# Altium PCB PCL.PcbDoc (part 1 of 3)
Units mil, origin at the board's own origin, x right, y up, seen from the top; angles counter-clockwise.
Board outline 5000 x 5000 mil, 4 copper layers (Top Layer, Layer 1, Layer 2, Bottom Layer), stack 64.009 mil thick; 153 components, 93 nets, 466 pads, 562 vias.
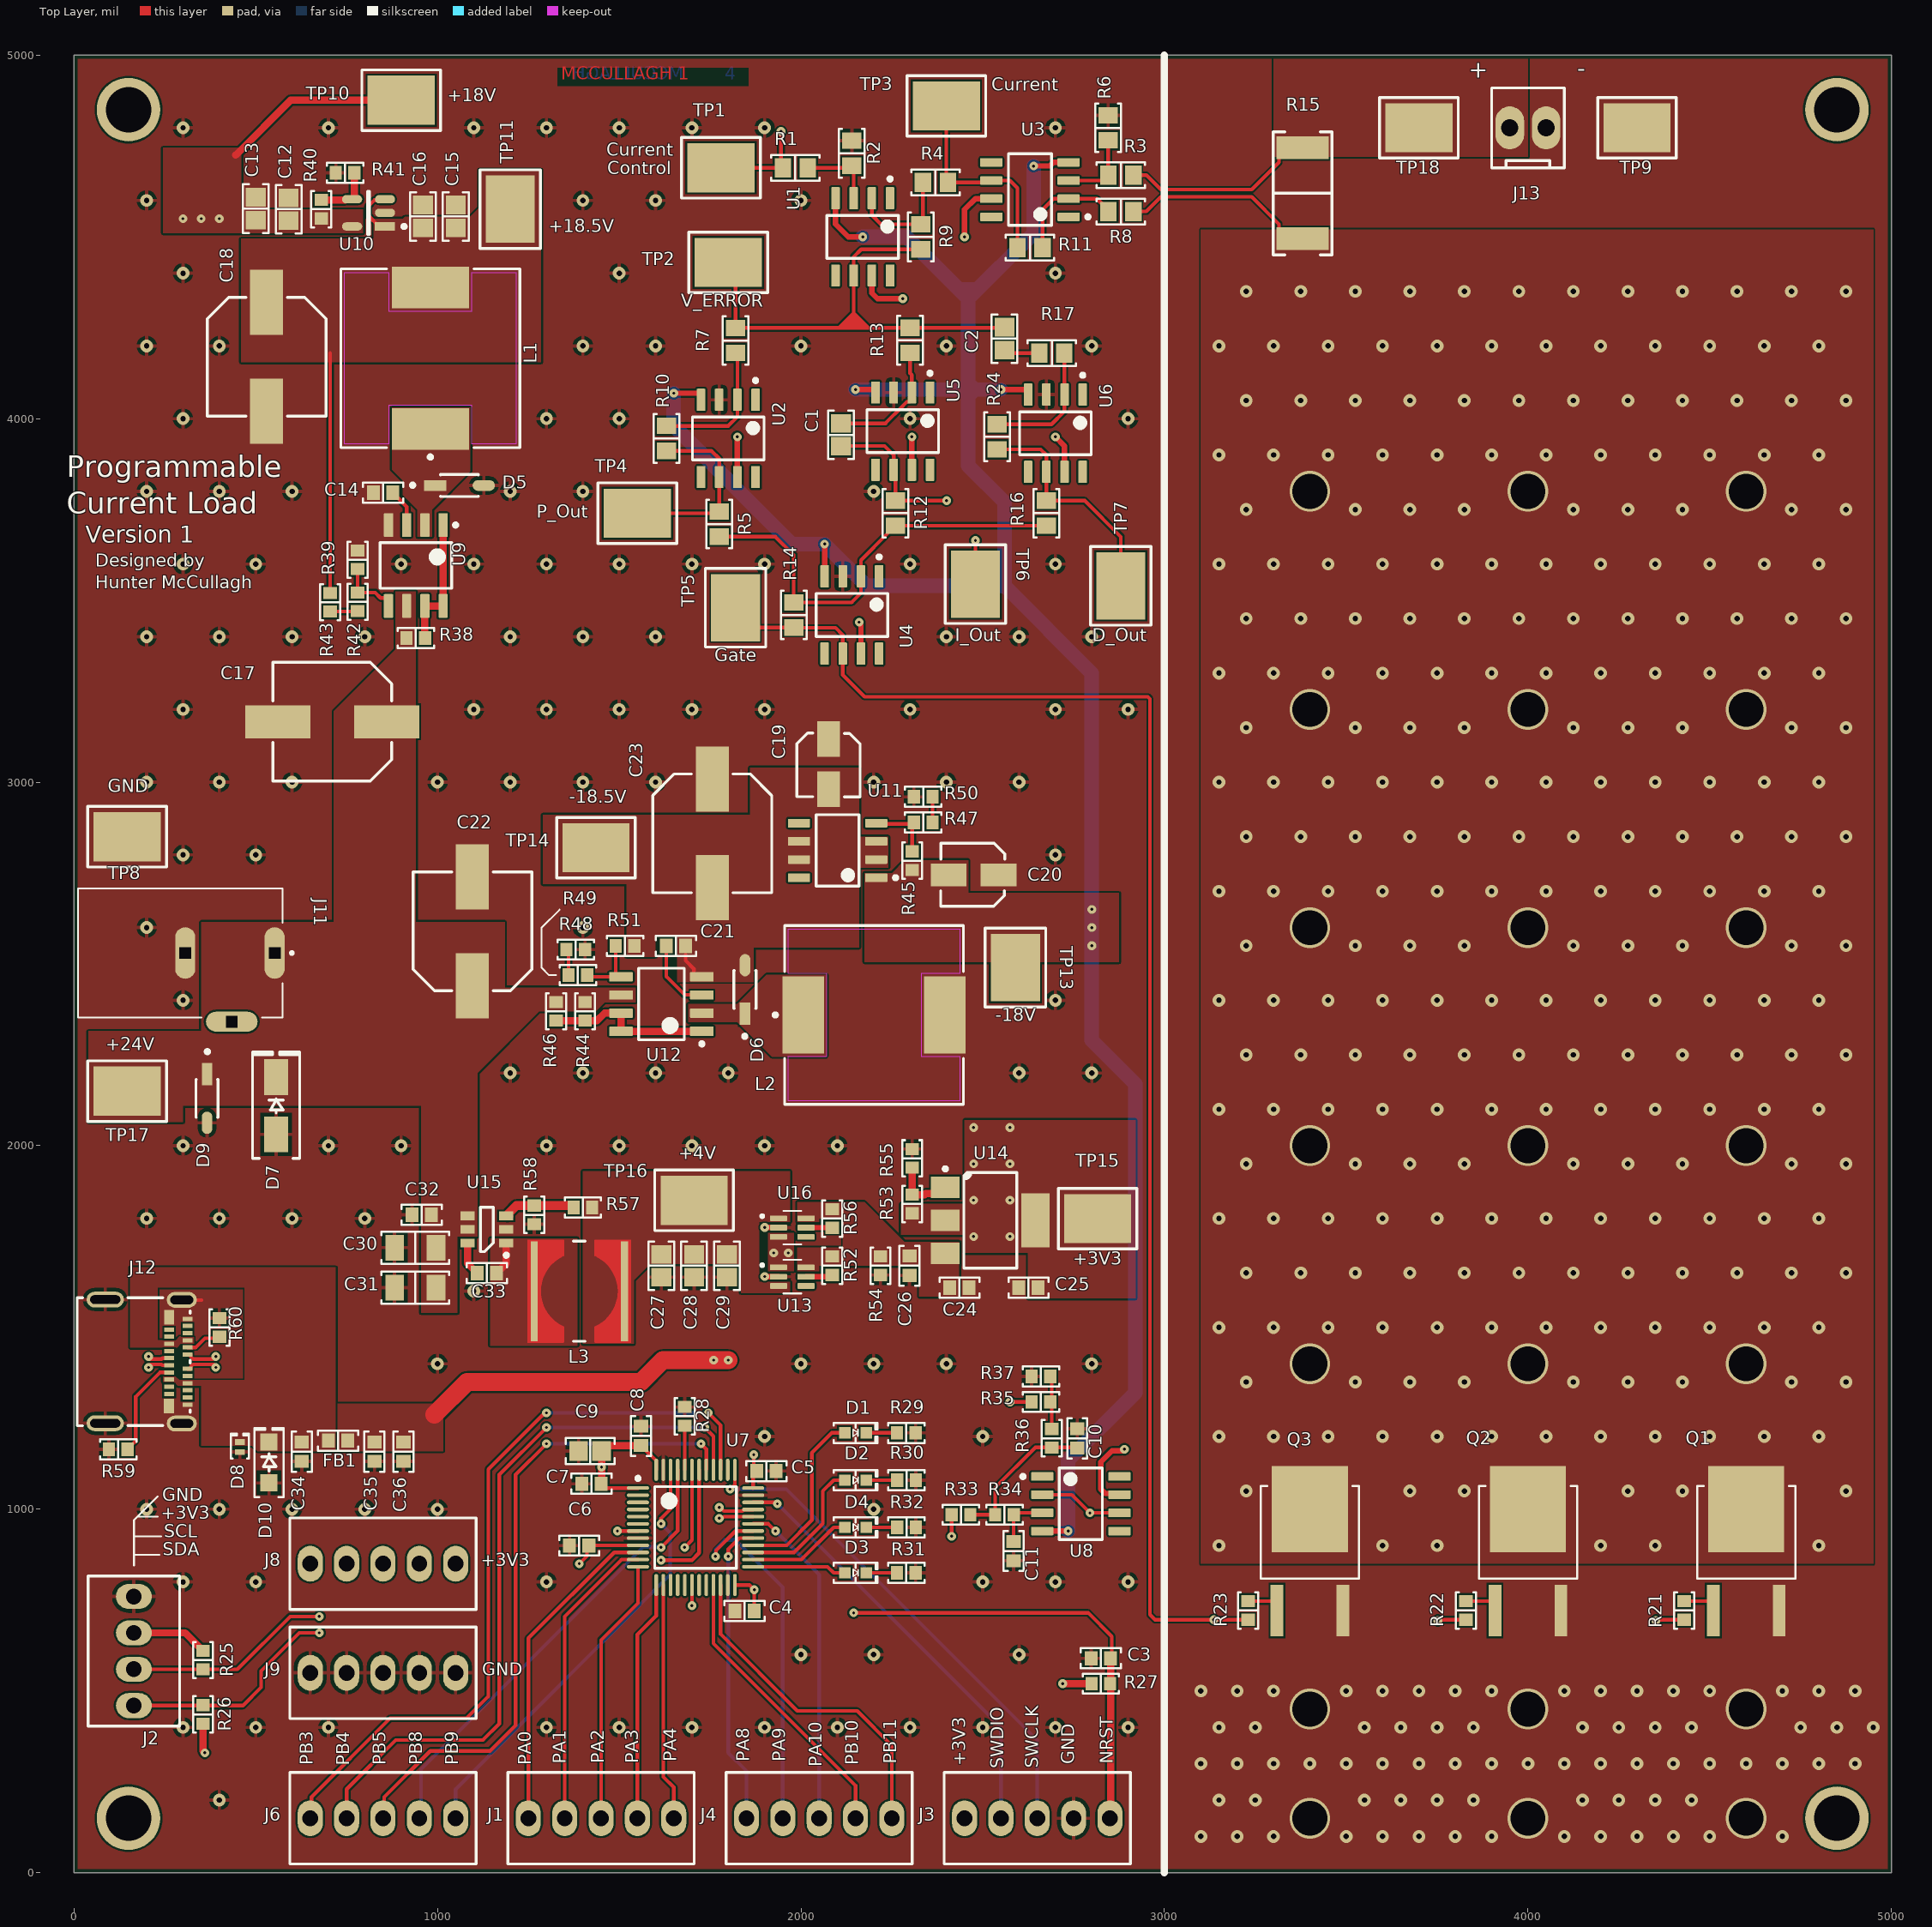
[diagram p0: Top Layer view]
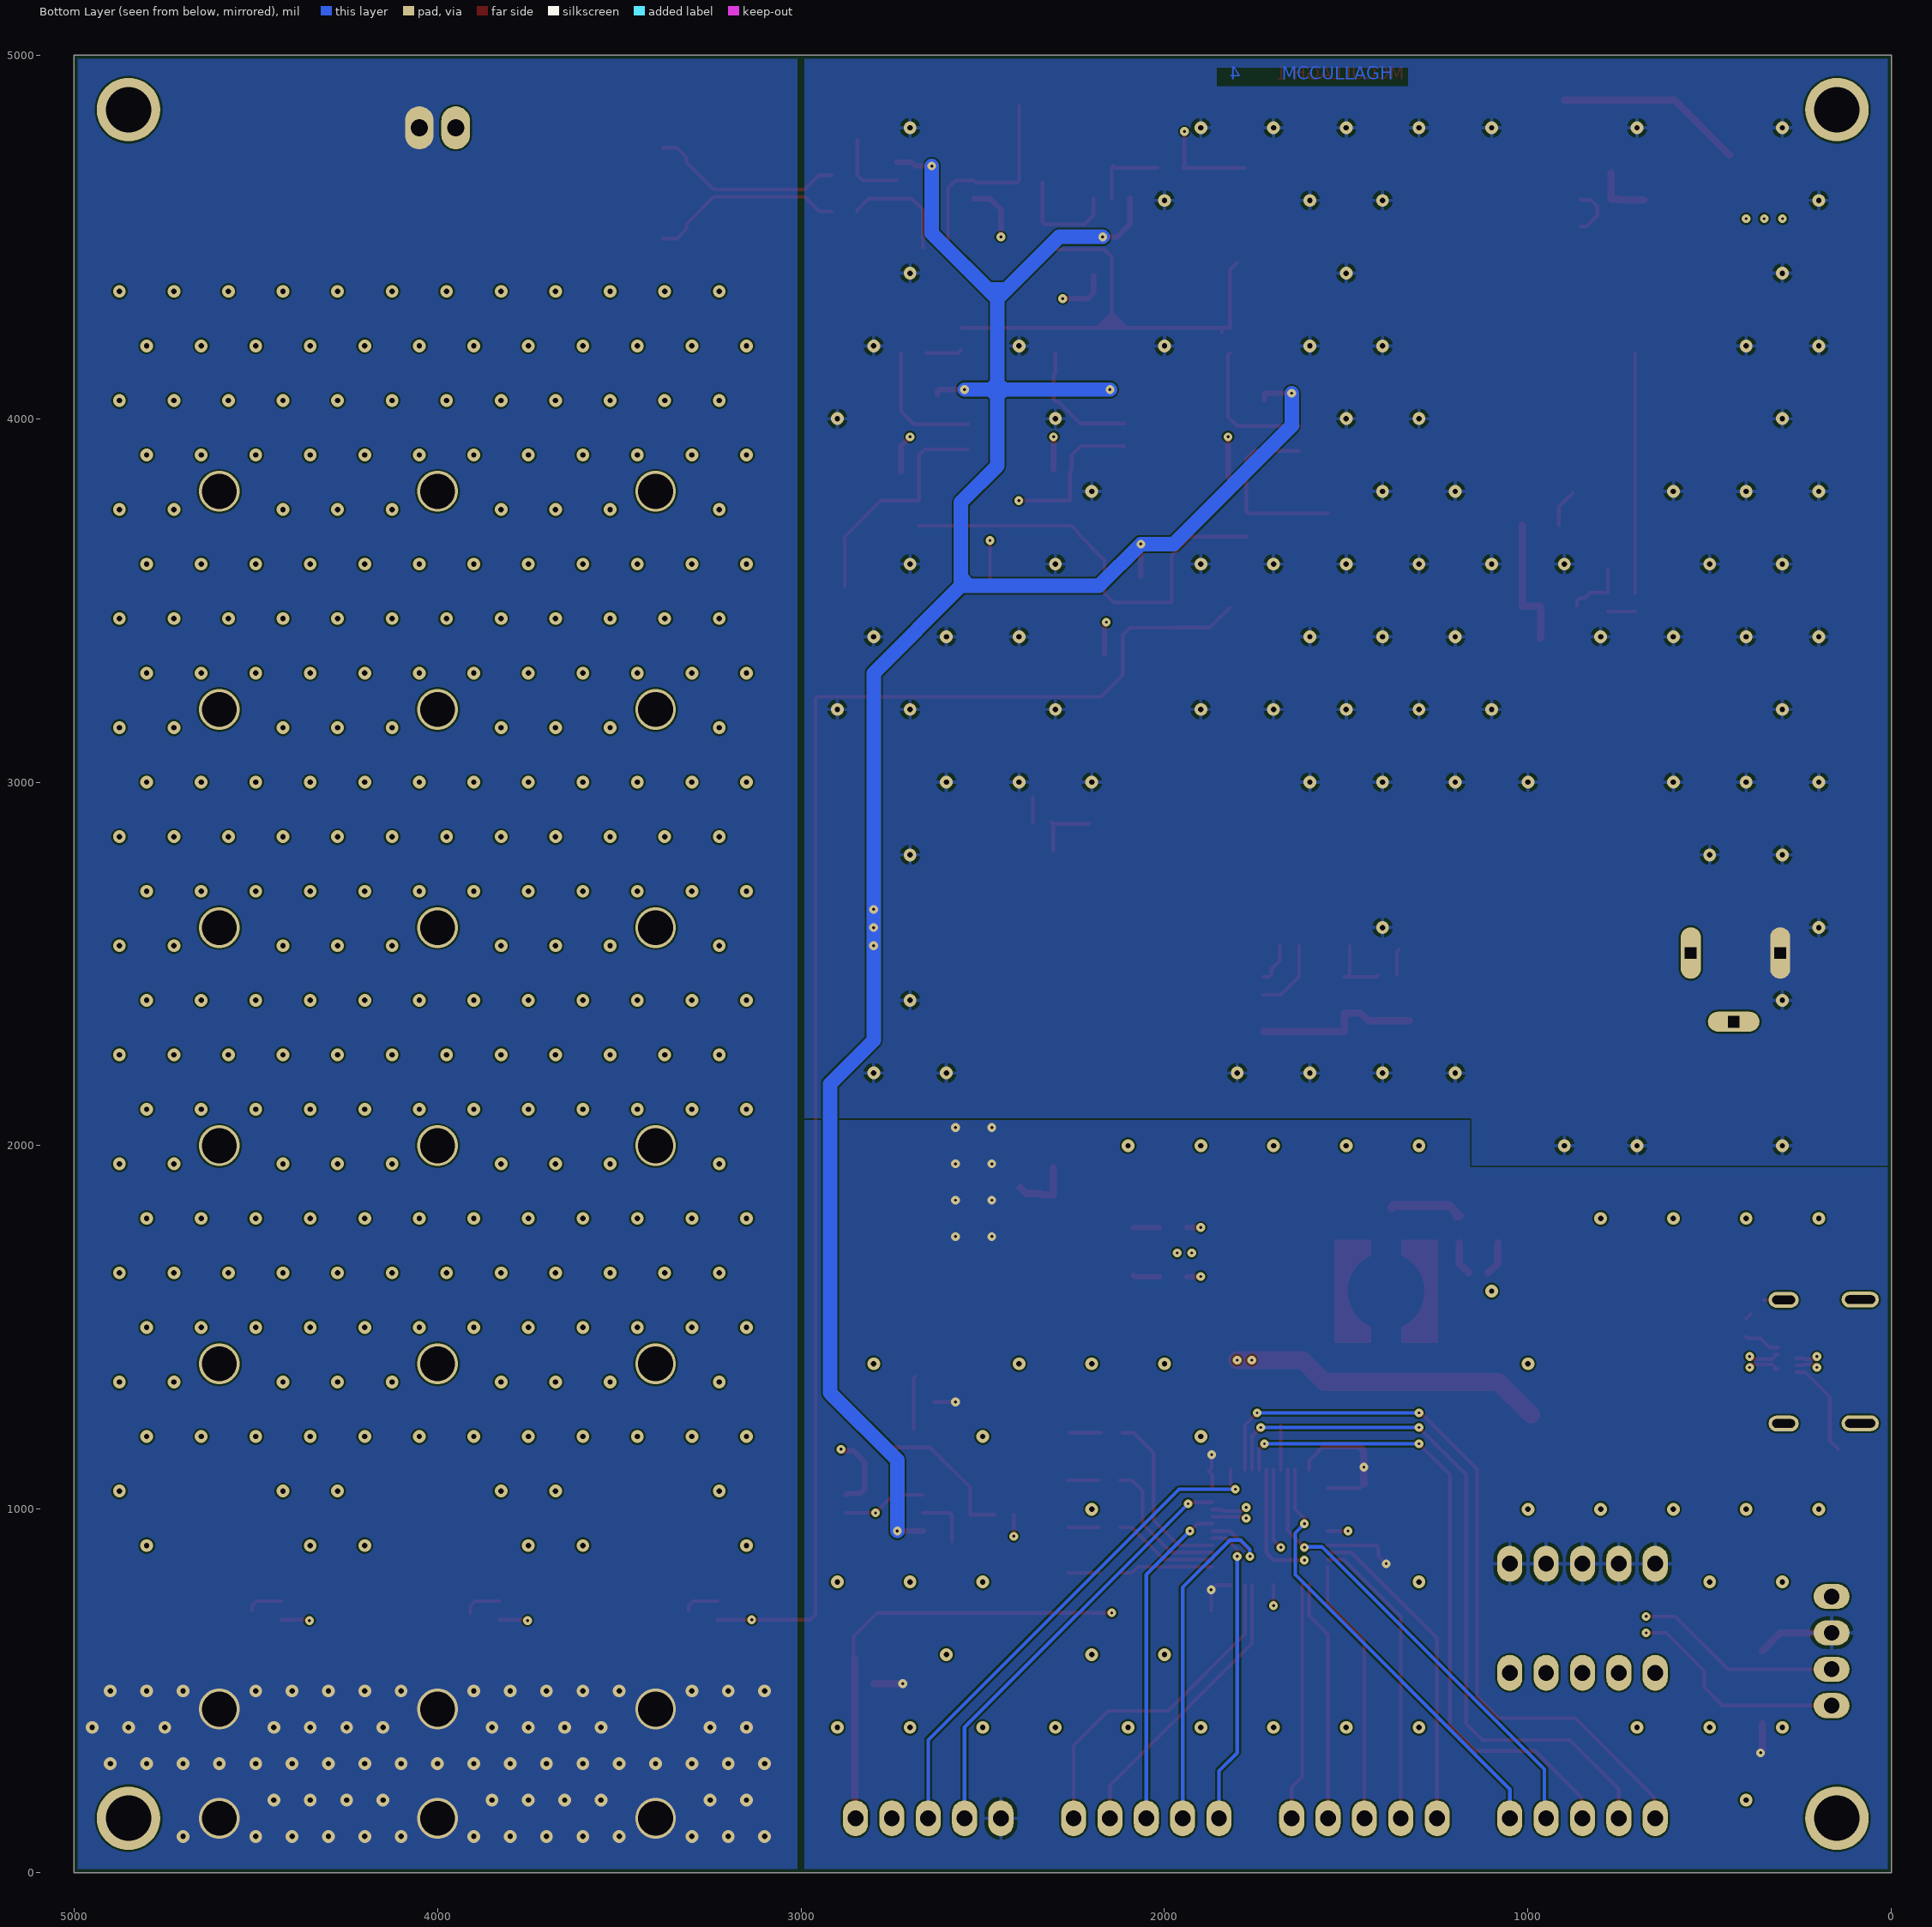
[diagram p1: Bottom Layer view, seen from below]
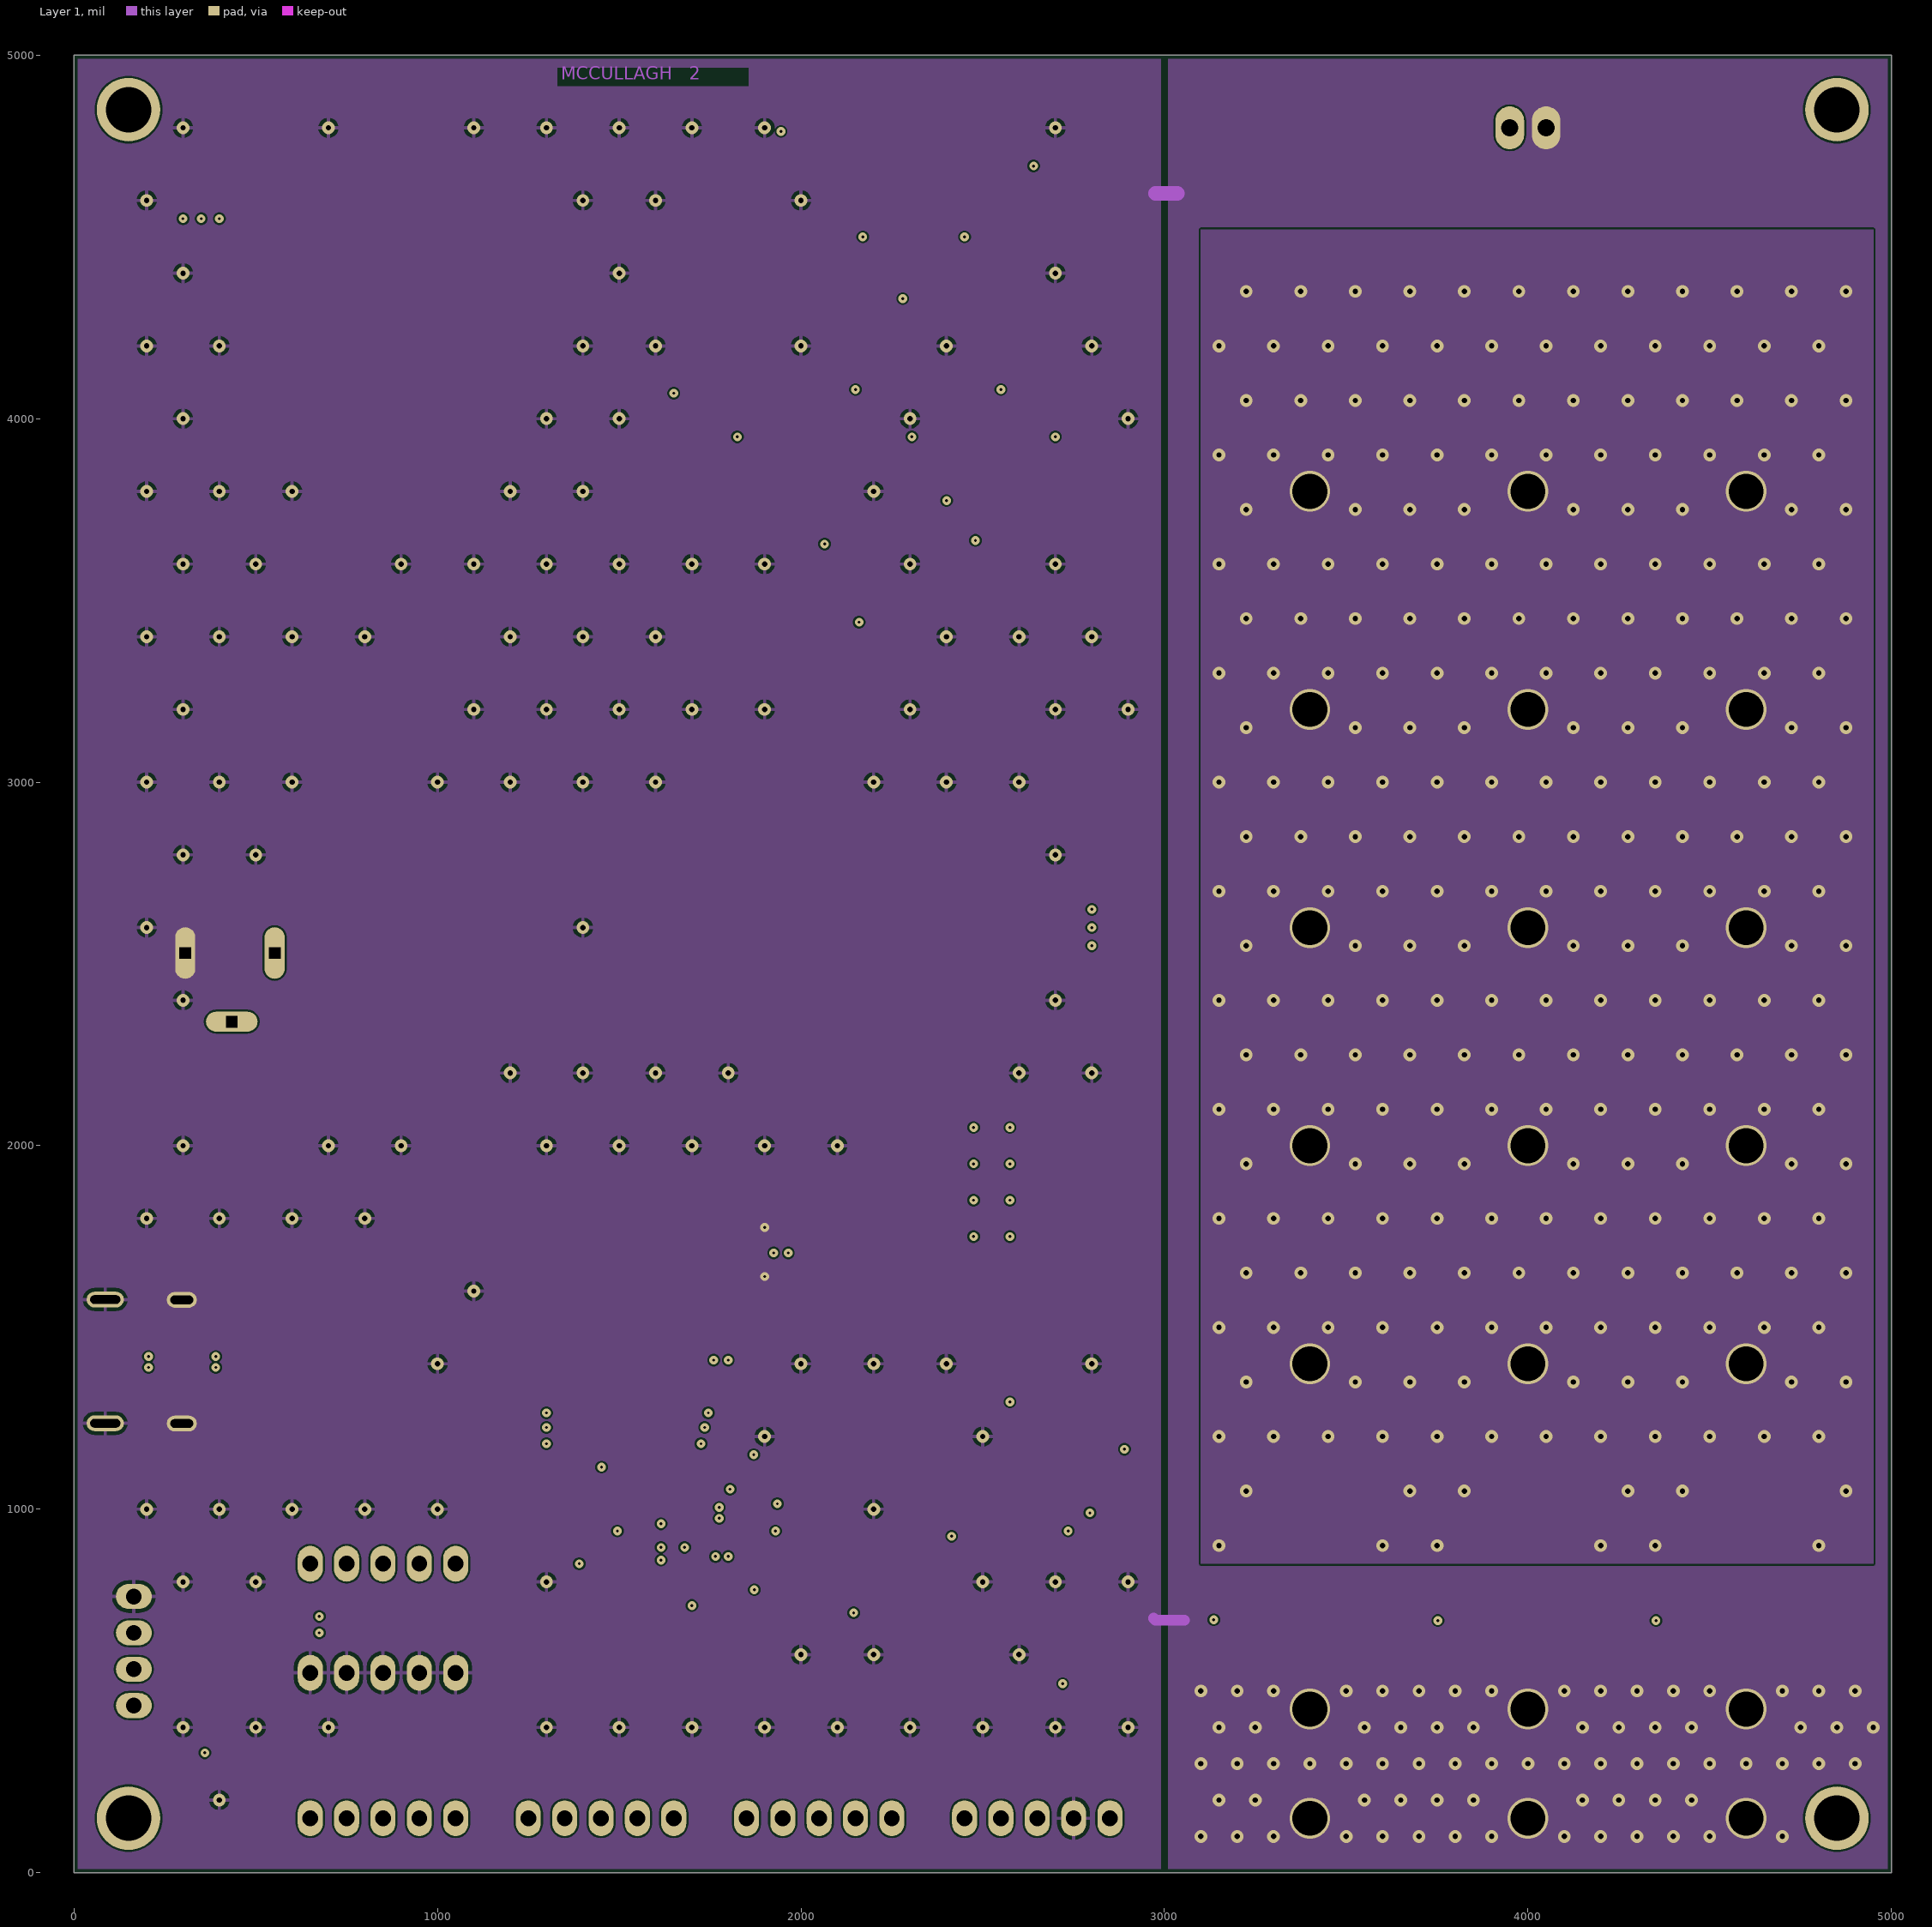
[diagram p2: Layer 1]
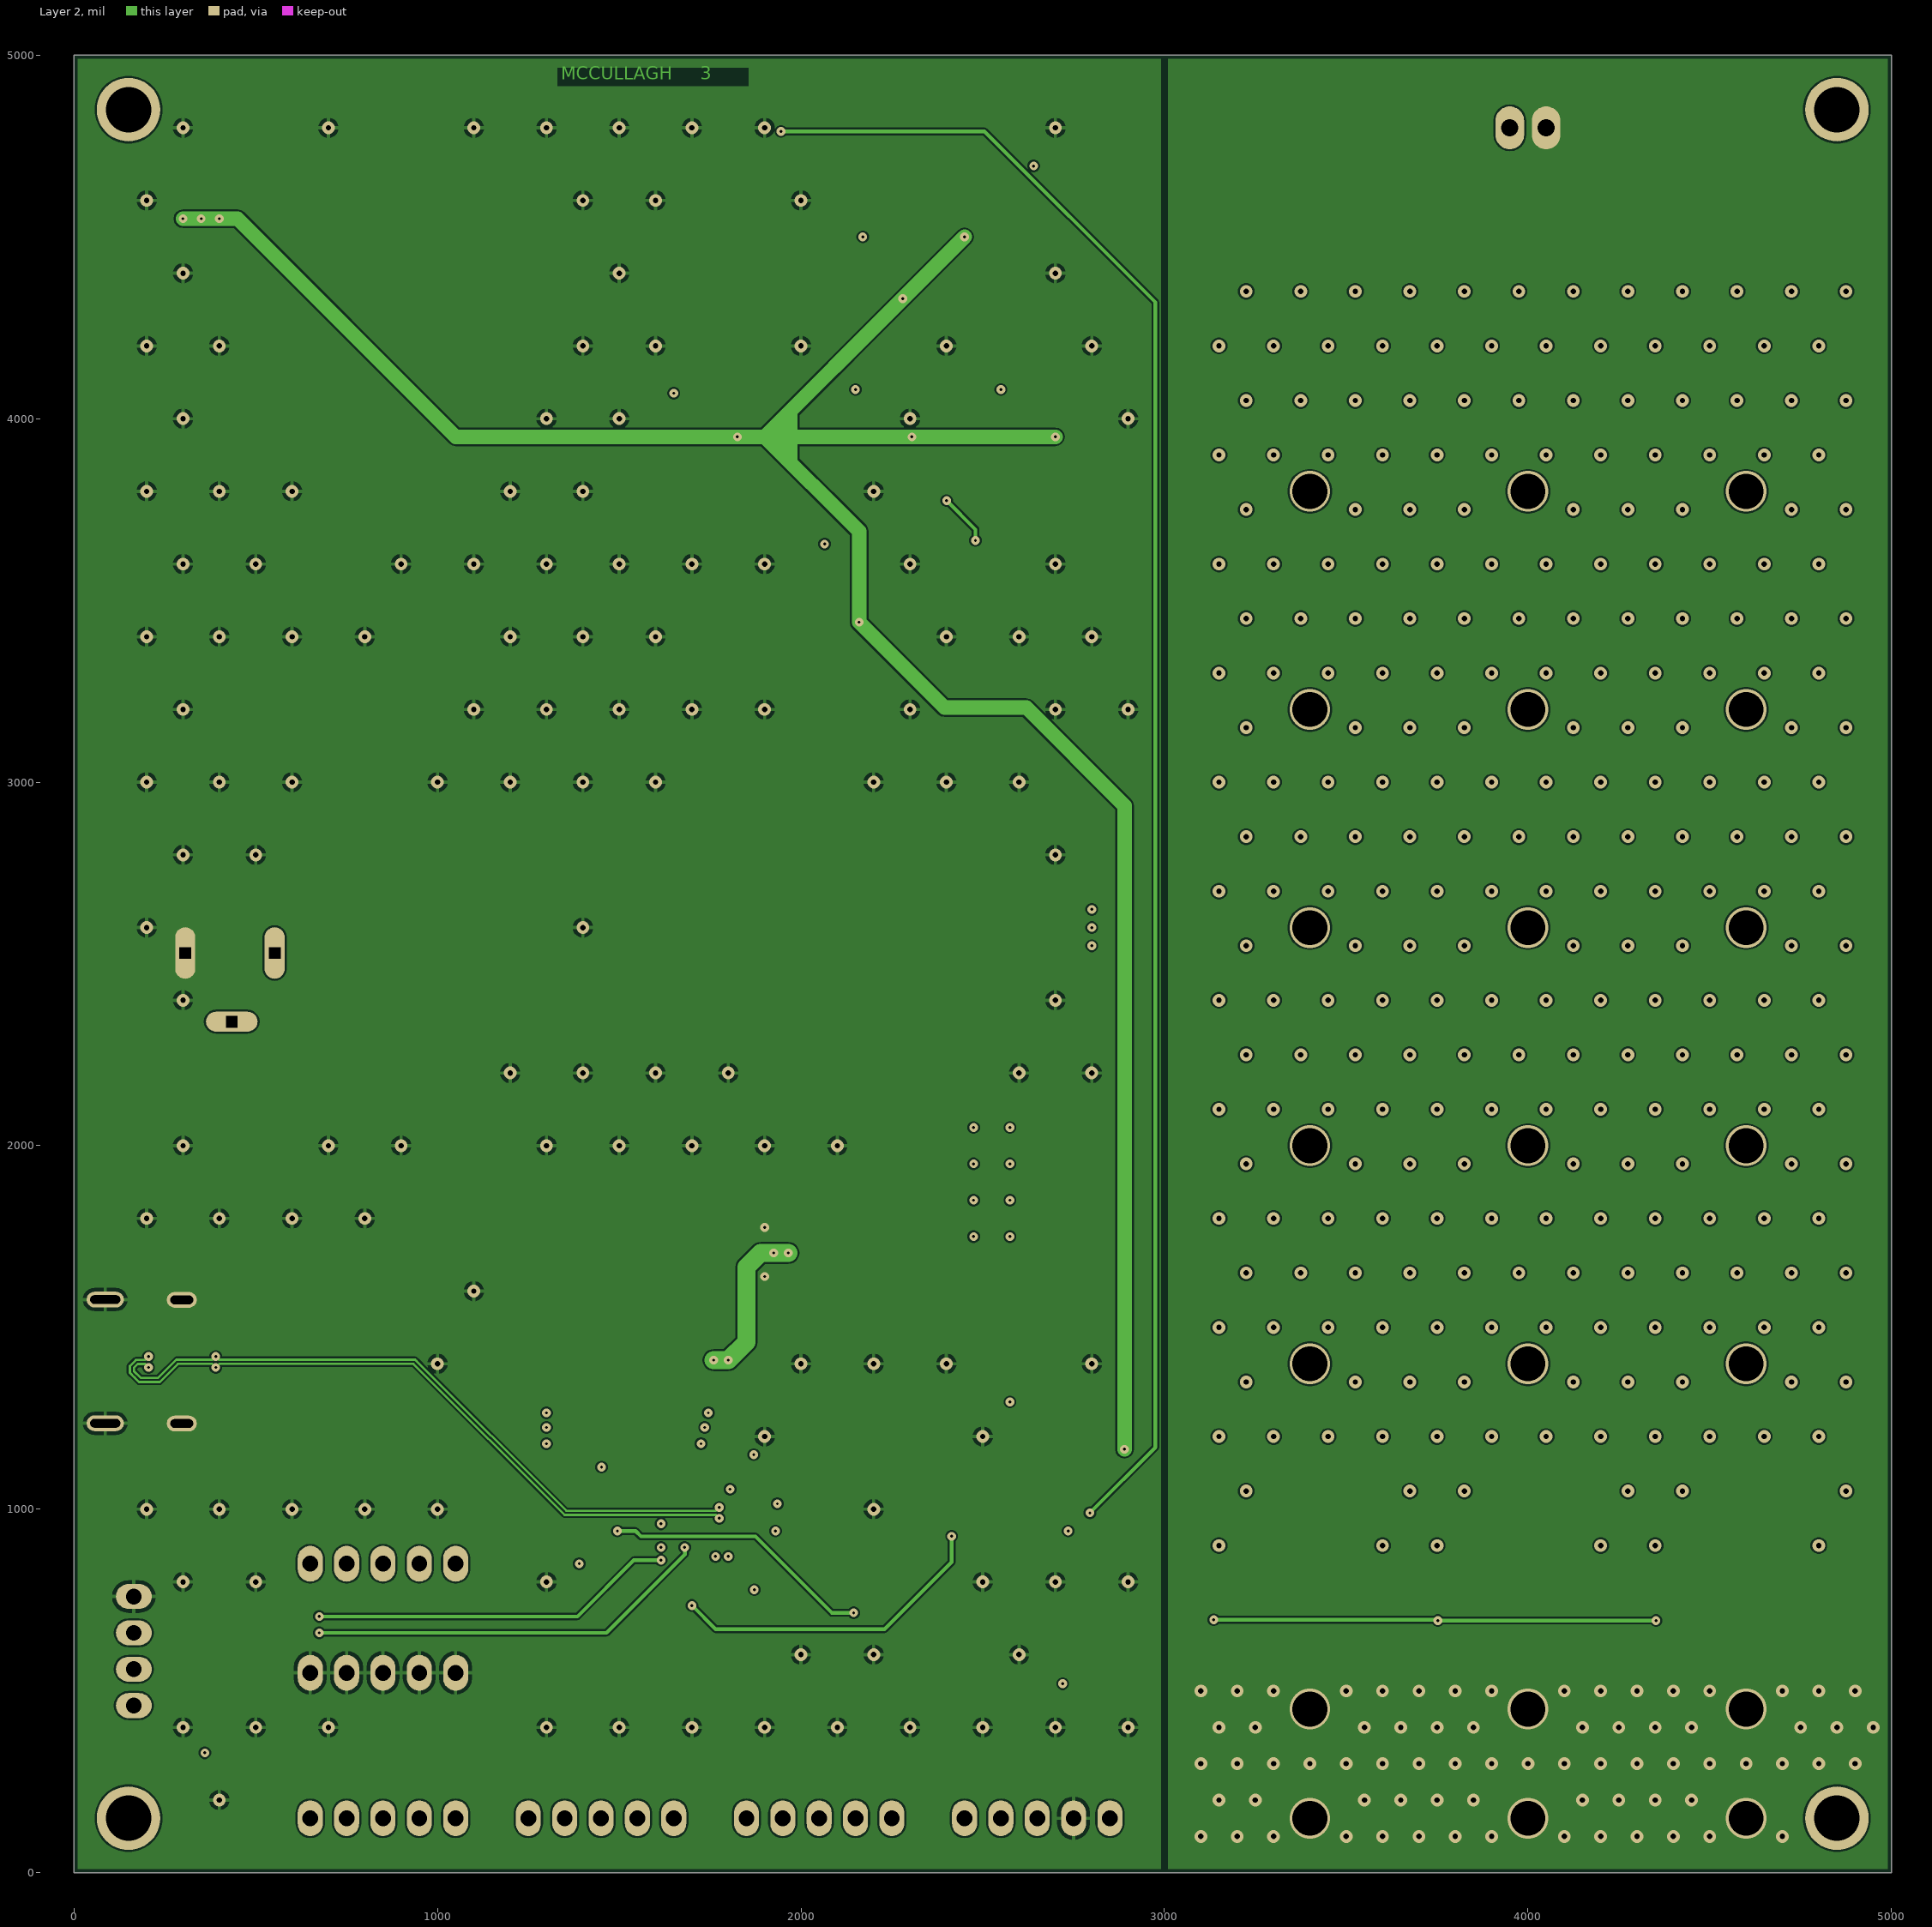
[diagram p3: Layer 2]
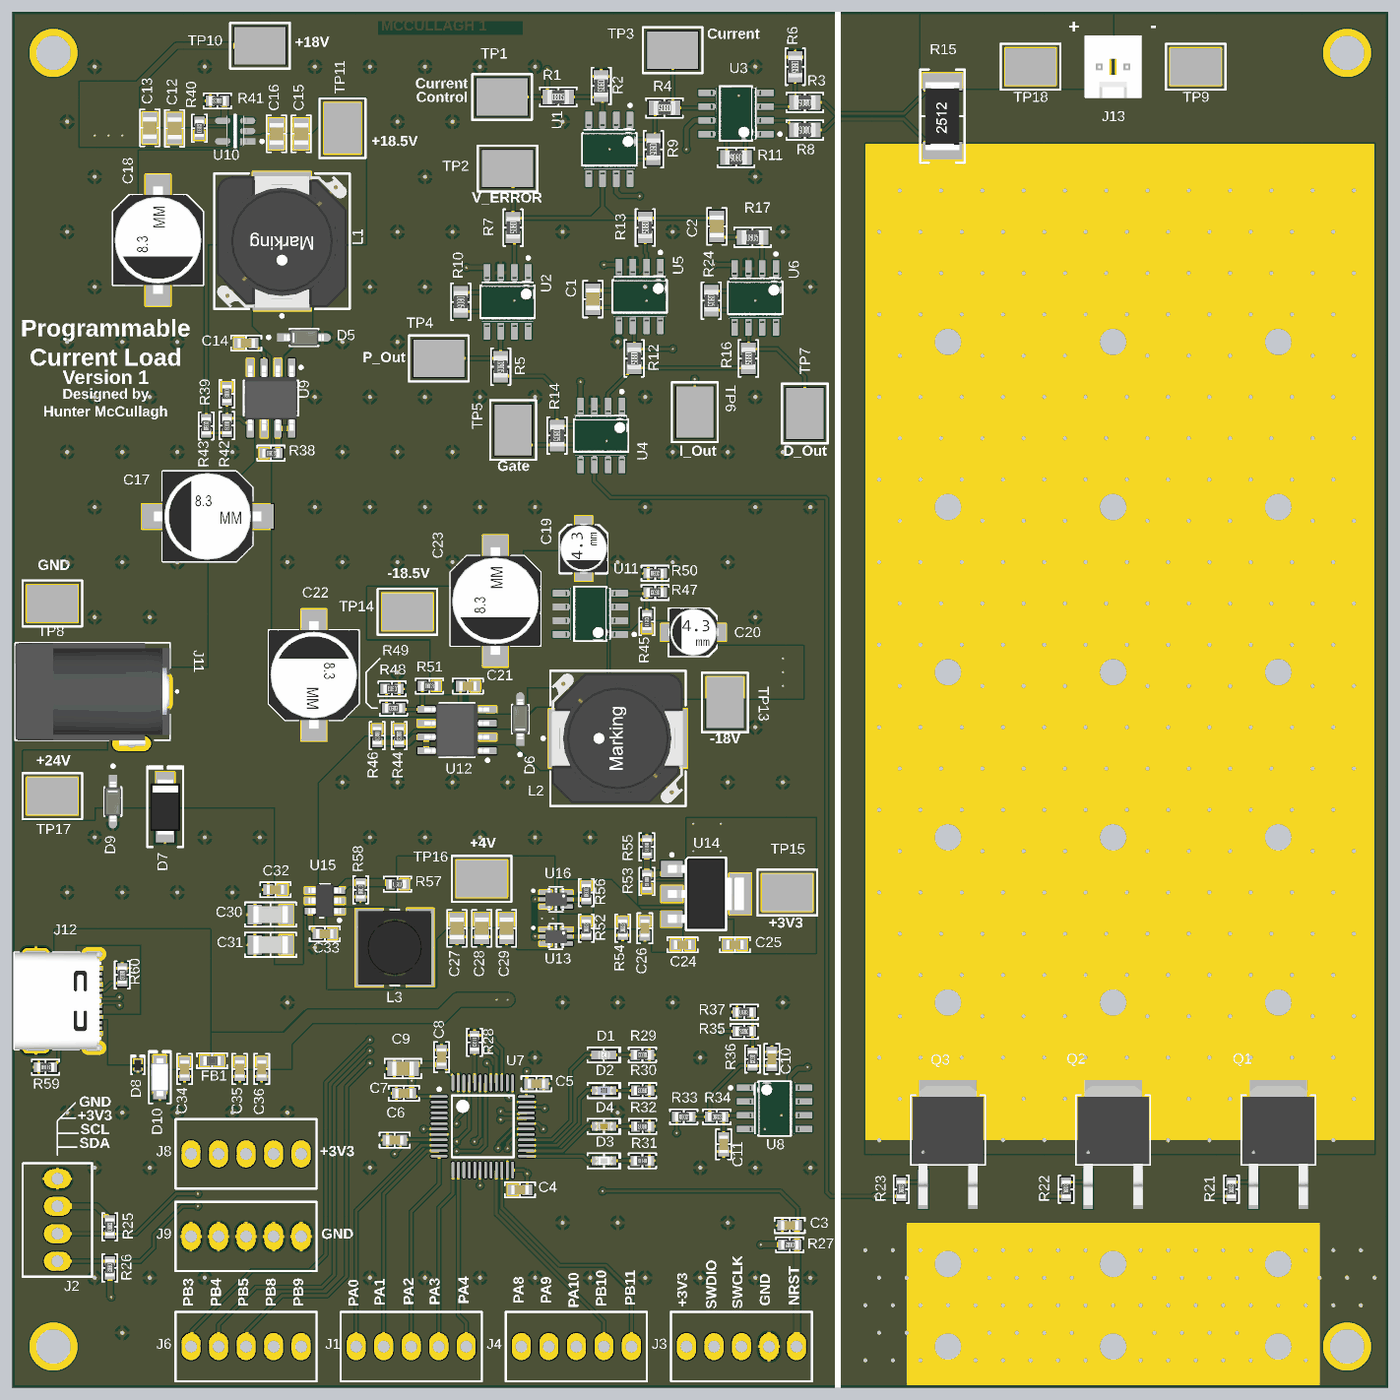
[diagram p5: 3D render of the assembled board from above, using the file's embedded part models]

## Layer stack, top to bottom
Top Solder: solder mask 0.4, Solder Resist, Dk 3.5
Top Layer: signal copper 1.378
Dielectric 2: prepreg 8.284, PP-006, Dk 4.1
Layer 1: signal copper 1.378
Dielectric 1: core 41.929, FR-4, Dk 4.8
Layer 2: signal copper 1.378
Dielectric 3: prepreg 8.284, PP-006, Dk 4.1
Bottom Layer: signal copper 1.378
Bottom Solder: solder mask 0.4, Solder Resist, Dk 3.5

## Board outline
0,0 5000,0 5000,5000 0,5000

## Design rules (kind name [scope] priority, off if disabled: settings)
Clearance [All] p1: gap=5 ignorepadtopadclearanceinfootprint=FALSE
DiffPairsRouting "Schematic Differential Pairs Routing_1" [InNet('d_p')] p1: maxlimit=5 minlimit=5 mostfreqgap=5 toplayer_minwidth=10.26 toplayer_maxwidth=10.26 toplayer_prefwidth=10.26 midlayer1_minwidth=6.27 midlayer1_maxwidth=6.27 midlayer1_prefwidth=6.27 midlayer2_minwidth=6.27 midlayer2_maxwidth=6.27 midlayer2_prefwidth=6.27 bottomlayer_minwidth=10.26 bottomlayer_maxwidth=10.26 bottomlayer_prefwidth=10.26 impedanceprofiledriven=TRUE impedanceprofileid={C0A551CF-3710-4AC8-B69E-5D6A2554CCB2} maxuncoupledlength=500
DiffPairsRouting "Schematic Differential Pairs Routing" [InNet('d_n')] p2: maxlimit=5 minlimit=5 mostfreqgap=5 toplayer_minwidth=10.26 toplayer_maxwidth=10.26 toplayer_prefwidth=10.26 midlayer1_minwidth=6.27 midlayer1_maxwidth=6.27 midlayer1_prefwidth=6.27 midlayer2_minwidth=6.27 midlayer2_maxwidth=6.27 midlayer2_prefwidth=6.27 bottomlayer_minwidth=10.26 bottomlayer_maxwidth=10.26 bottomlayer_prefwidth=10.26 impedanceprofiledriven=TRUE impedanceprofileid={C0A551CF-3710-4AC8-B69E-5D6A2554CCB2} maxuncoupledlength=500
DiffPairsRouting [All] p3: maxlimit=10 minlimit=10 mostfreqgap=10 toplayer_minwidth=15 toplayer_maxwidth=15 toplayer_prefwidth=15 midlayer1_minwidth=15 midlayer1_maxwidth=15 midlayer1_prefwidth=15 midlayer2_minwidth=15 midlayer2_maxwidth=15 midlayer2_prefwidth=15 bottomlayer_minwidth=15 bottomlayer_maxwidth=15 bottomlayer_prefwidth=15 maxuncoupledlength=500
HoleSize [All] p1: absolutevalues=TRUE maxlimit=2000 minlimit=1 maxpercent=80.000 minpercent=20.000
MinimumSolderMaskSliver [All] p1: minsoldermaskwidth=1
PolygonConnect PolygonConnect_7 [All vs InNet('+4V')] p1: connectstyle=Direct reliefconductorwidth=10 reliefentries=4 polygonreliefangle="90 Angle" airgapwidth=10
PolygonConnect PolygonConnect_9 [All vs InNet('NetC24_2')] p2: connectstyle=Direct reliefconductorwidth=10 reliefentries=4 polygonreliefangle="90 Angle" airgapwidth=10
PolygonConnect PolygonConnect_6 [All vs InNet('+VUSB')] p3: connectstyle=Direct reliefconductorwidth=10 reliefentries=4 polygonreliefangle="90 Angle" airgapwidth=10
PolygonConnect PolygonConnect_8 [All vs InNet('+VUSB_IN')] p4: connectstyle=Direct reliefconductorwidth=10 reliefentries=4 polygonreliefangle="90 Angle" airgapwidth=10
PolygonConnect PolygonConnect_5 [All vs InNet('+18.5V')] p5: connectstyle=Direct reliefconductorwidth=10 reliefentries=4 polygonreliefangle="90 Angle" airgapwidth=10
PolygonConnect PolygonConnect_4 [All vs InNet('-18.5V')] p6: connectstyle=Direct reliefconductorwidth=10 reliefentries=4 polygonreliefangle="90 Angle" airgapwidth=10
PolygonConnect PolygonConnect_3 [All vs InNet('+24V')] p7: connectstyle=Direct reliefconductorwidth=10 reliefentries=4 polygonreliefangle="90 Angle" airgapwidth=10
PolygonConnect PolygonConnect_2 [All vs InNet('VIN')] p8: connectstyle=Direct reliefconductorwidth=10 reliefentries=4 polygonreliefangle="90 Angle" airgapwidth=10
PolygonConnect PolygonConnect_1 [All vs InNet('VIN_SENSE')] p9: connectstyle=Direct reliefconductorwidth=10 reliefentries=4 polygonreliefangle="90 Angle" airgapwidth=10
PolygonConnect [All] p10: connectstyle=Relief reliefconductorwidth=10 reliefentries=4 polygonreliefangle="90 Angle" airgapwidth=10
RoutingVias [All] p1: holewidth=28 width=50 viastyle="Through Hole" minholewidth=28 minwidth=50 maxholewidth=28 maxwidth=50
SilkToSilkClearance [All] p1: silktosilkclearance=0.1
SilkToSolderMaskClearance [IsPad] p1: minsilkscreentomaskgap=0.1 clearancetoexposedcopper=TRUE
SolderMaskExpansion [All] p1: expansion=4 istentingtop=FALSE
SupplyNets "Schematic Supply Nets_12" [InNet('VIN')] p1: voltage=0.000
SupplyNets "Schematic Supply Nets_11" [InNet('+VUSB')] p2: voltage=0.000
SupplyNets "Schematic Supply Nets_10" [InNet('-18V')] p3: voltage=0.000
SupplyNets "Schematic Supply Nets_9" [InNet('+18.5V')] p4: voltage=0.000
SupplyNets "Schematic Supply Nets_8" [InNet('+24V')] p5: voltage=0.000
SupplyNets "Schematic Supply Nets_6" [InNet('+4V')] p6: voltage=0.000
SupplyNets "Schematic Supply Nets_5" [InNet('VIN_SENSE')] p7: voltage=0.000
SupplyNets "Schematic Supply Nets_4" [InNet('+18V')] p8: voltage=0.000
SupplyNets "Schematic Supply Nets_3" [InNet('GND')] p9: voltage=0.000
SupplyNets "Schematic Supply Nets_2" [InNet('+VUSB_IN')] p10: voltage=0.000
SupplyNets "Schematic Supply Nets_1" [InNet('+3V3')] p11: voltage=0.000
SupplyNets "Schematic Supply Nets" [InNet('-18.5V')] p12: voltage=0.000
Width [All] p1: maxlimit=200 minlimit=2 preferedwidth=10
25 further rules are at their usual default settings.

## Classes and differential pairs
component class PCL-04: C34 C35 C36 D7 D8 D9 D10 FB1 J11 J12 R59 R60 TP17
component class PCL-03: C12 C13 C14 C15 C16 C17 C18 C19 C20 C21 C22 C23 C24 C25 C26 C27 C28 C29 C30 C31 C32 C33 D5 D6 L1 L2 L3 R38 R39 R40 R41 R42 R43 R44 R45 R46 R47 R48 R49 R50 R51 R52 R53 R54 R55 R56 R57 R58 TP10 TP11 TP13 TP14 TP15 TP16 U9 U10 U11 U12 U13 U14 U15 U16
component class PCL-02: C3 C4 C5 C6 C7 C8 C9 C10 C11 D1 D2 D3 D4 J1 J2 J3 J4 J6 J8 J9 R25 R26 R27 R28 R29 R30 R31 R32 R33 R34 R35 R36 R37 U7 U8
component class PCL-01: C1 C2 J13 Q1 Q2 Q3 R1 R2 R3 R4 R5 R6 R7 R8 R9 R10 R11 R12 R13 R14 R15 R16 R17 R21 R22 R23 R24 TP1 TP2 TP3 TP4 TP5 TP6 TP7 TP8 TP9 TP18 U1 U2 U3 U4 U5 U6
differential pair d: +d_p -d_n

## Components (designator, comment, footprint, x,y, rotation, side; value= is the part's Value field where it differs from the comment)
C1 "1 µF" "CAP 0805_2012" 2110,3955.55 r270 top
C2 "1 µF" "CAP 0805_2012" 2560,4220 r270 top
C3 "0.1 µF" "CAP 0603_1608" 2825,590 r0 top
C4 "0.1 µF" "CAP 0603_1608" 1845,720 r0 top
C5 "0.1 µF" "CAP 0603_1608" 1905,1105 r180 top
C6 "0.1 µF" "CAP 0603_1608" 1390,900 r0 top
C7 "0.1 µF" "CAP 0603_1608" 1423.43,1070 r0 top
C8 "0.1 µF" "CAP 0603_1608" 1560,1201.57 r270 top
C9 "1µF" "CAP 0805_2012" 1420,1160 r0 top
C10 "1 µF" "CAP 0603_1608" 2760,1195 r270 top
C11 "1 µF" "CAP 0603_1608" 2585,885 r90 top
C12 "4.7 µF" "CAP 0805_2012" 590.38,4576.1 r270 top
C13 "4.7 µF" "CAP 0805_2012" 500.38,4577.6 r270 top
C14 "330 pF" "CAP 0603_1608" 850.38,3796.1 r180 top
C15 "1 µF" "CAP 0805_2012" 1050.38,4556.1 r270 top
C16 "1 µF" "CAP 0805_2012" 960.38,4556.1 r270 top
C17 "100 µF" "CAP ALSMD 8.3MM H10.5MM" 710.38,3166.1 r180 top
C18 "470 µF" "CAP ALSMD 8.3MM H10.5MM" 530,4170 r270 top
C19 "10 µF" "CAP ALSMD 4.3MM H5.4MM" 2076.1,3049.62 r270 top
C20 "10 µF" "CAP ALSMD 4.3MM H5.4MM" 2475,2745 r180 top
C21 "180pF" "CAP 0603_1608" 1656.1,2549.62 r180 top
C22 "100 µF" "CAP ALSMD 8.3MM H10.5MM" 1096.1,2589.62 r90 top
C23 "470 µF" "CAP ALSMD 8.3MM H10.5MM" 1756.1,2859.23 r270 top
C24 "0.1 µF" "CAP 0603_1608" 2436.1,1609.62 r180 top
C25 "2.2 µF" "CAP 0603_1608" 2626.1,1609.62 r0 top
C26 "0.1 µF" "CAP 0603_1608" 2298.54,1669.62 r90 top
C27 "10 µF" "CAP 0805_2012" 1616.1,1669.62 r90 top
C28 "10 µF" "CAP 0805_2012" 1706.1,1669.62 r90 top
C29 "10 µF" "CAP 0805_2012" 1796.1,1669.62 r90 top
C30 "4.7 µF" "CAP 1206_3216 - 0.8MM" 939.02,1719.62 r0 top
C31 "4.7 µF" "CAP 1206_3216 - 0.8MM" 939.02,1609.62 r0 top
C32 "0.1 µF" "CAP 0603_1608" 956.57,1810 r0 top
C33 "0.1 µF" "CAP 0603_1608" 1136.1,1649.62 r0 top
C34 "0.1 µF" "CAP 0603_1608" 626.61,1158.43 r90 top
C35 "0.1 µF" "CAP 0603_1608" 826.61,1158.43 r90 top
C36 "1µF" "CAP 0603_1608" 906.61,1158.43 r90 top
D1 "White" "LED 0603_1608" 2150,1210 r0 top
D2 "Blue" "LED 0603_1608 BLUE" 2150.47,1080 r0 top
D3 "Green" "LED 0603_1608 GREEN" 2150.47,825 r0 top
D4 "Red" "LED 0603_1608 RED" 2150.47,950 r0 top
D5 "1N5819HW-7-F" FP-SOD123-IPC_A 1060.38,3816.1 r0 top
D6 "1N5819HW-7-F" FP-SOD123-IPC_A 1846.1,2429.62 r90 top
D7 "SMA6T15AY" "DO214AC SMA" 556.1,2110 r90 top
D8 "TPD1E05U06DPYT" 0402 456.61,1171.22 r90 top
D9 "1N5819HW-7-F" FP-SOD123-IPC_A 366.1,2130 r270 top
D10 "DSS12UTR" SOD123F 536.61,1128.7 r90 top
FB1 "120 Ohms @ 100 MHz" "FER 0603_1608" 726.61,1188.7 r0 top
J1 "282834-5" "TE 282834-5" 1450,150 r0 top
J2 "282834-4" "TE 282834-4" 164.61,609.92 r270 top
J3 "282834-5" "TE 282834-5" 2650,150 r0 top
J4 "282834-5" "TE 282834-5" 2050,150 r0 top
J6 "282834-5" "TE 282834-5" 850,150 r0 top
J8 "282834-5" "TE 282834-5" 850,850 r0 top
J9 "282834-5" "TE 282834-5" 850,550 r0 top
J11 "54-00166" TENSILITY_54-00166 306.1,2530 r270 top
J12 "1054500101" "Molex 1054500101" 287.01,1405.79 r270 top locked
J13 "0022272021" "MOLEX KK 0022272021" 4000,4800 r0 top
L1 "7447706221" WE-PD_1260P 980.38,4166.1 r180 top
L2 "7447706221" WE-PD_1260P 2200.98,2359.62 r90 top
L3 "18 µH" "BOURNS SRR6028" 1390.12,1599.62 r0 top
Q1 "RD3L050SNTL1" TRANS_RD3H045S_ROM 4600.55,936.5 r0 top
Q2 "RD3L050SNTL1" TRANS_RD3H045S_ROM 4000,936.5 r0 top
Q3 "RD3L050SNTL1" TRANS_RD3H045S_ROM 3400,936.5 r0 top
R1 "1kΩ" "RES 0805_2012" 1984.45,4690 r0 top
R2 "1kΩ" "RES 0805_2012" 2140,4730 r270 top
R3 "1kΩ" "RES 0805_2012" 2880,4670 r180 top
R4 "1kΩ" "RES 0805_2012" 2370,4650 r180 top
R5 "1kΩ" "RES 0805_2012" 1775,3710 r270 top
R6 "10kΩ" "RES 0805_2012" 2845,4800 r270 top
R7 "1kΩ" "RES 0805_2012" 1820,4215 r270 top
R8 "1kΩ" "RES 0805_2012" 2880,4570 r180 top
R9 "1kΩ" "RES 0805_2012" 2330,4500 r270 top
R10 "10Ω" "RES 0805_2012" 1630,3945.55 r270 top
R11 "10kΩ" "RES 0805_2012" 2630,4470 r180 top
R12 "1kΩ" "RES 0805_2012" 2260,3740 r270 top
R13 "1kΩ" "RES 0805_2012" 2300,4215.55 r270 top
R14 "1kΩ" "RES 0805_2012" 1980,3460 r270 top
R15 "0.1Ω" "RES 2512_6432" 3380,4620 r90 top value="100 mOhms"
R16 "1kΩ" "RES 0805_2012" 2675,3740 r270 top
R17 "1kΩ" "RES 0805_2012" 2690,4180 r0 top
R21 "10Ω" "RES 0603_1608" 4430,721.5 r90 top
R22 "10Ω" "RES 0603_1608" 3829.45,721.5 r90 top
R23 "10Ω" "RES 0603_1608" 3230,721.5 r90 top
R24 "10Ω" "RES 0805_2012" 2540,3950 r270 top
R25 "4.7kΩ" "RES 0603_1608" 355,585 r90 top value="4.7 kOhms"
R26 "4.7kΩ" "RES 0603_1608" 355,435.59 r270 top value="4.7 kOhms"
R27 "10kΩ" "RES 0603_1608" 2825,520 r180 top value="10 kOhms"
R28 "10kΩ" "RES 0603_1608" 1680,1255.59 r270 top value="10 kOhms"
R29 "100Ω" "RES 0603_1608" 2290,1210 r180 top
R30 "100Ω" "RES 0603_1608" 2290.47,1080 r180 top
R31 "100Ω" "RES 0603_1608" 2290,825 r180 top
R32 "250Ω" "RES 0603_1608" 2290.47,950 r180 top
R33 "1kΩ" "RES 0603_1608" 2440,985 r0 top
R34 "1kΩ" "RES 0603_1608" 2560,985 r0 top
R35 "10kΩ" "RES 0603_1608" 2660,1295 r180 top value="10 kOhms"
R36 "1kΩ" "RES 0603_1608" 2690,1195 r270 top
R37 "1kΩ" "RES 0603_1608" 2660,1365 r0 top
R38 "1.5Ω" "RES 0603_1608" 940.38,3396.1 r0 top
R39 "1kΩ" "RES 0603_1608" 780.38,3611.69 r270 top
R40 "13.5kΩ" "RES 0603_1608" 680.38,4576.1 r90 top
R41 "1kΩ" "RES 0603_1608" 745.97,4676.1 r180 top
R42 "13.5kΩ" "RES 0603_1608" 780.38,3496.1 r270 top
R43 "300Ω" "RES 0603_1608" 705,3495 r90 top
R44 "1.5Ω" "RES 0603_1608" 1406.1,2369.62 r270 top
R45 "240Ω" "RES 0603_1608" 2306.1,2784.03 r90 top
R46 "1.5Ω" "RES 0603_1608" 1326.1,2369.62 r270 top
R47 "2.2kΩ" "RES 0603_1608" 2336.1,2889.62 r180 top
R48 "13.5kΩ" "RES 0603_1608" 1380.51,2539.62 r180 top
R49 "300Ω" "RES 0603_1608" 1386.1,2469.62 r0 top
R50 "1kΩ" "RES 0603_1608" 2336.1,2959.62 r0 top
R51 "1kΩ" "RES 0603_1608" 1516.1,2549.62 r0 top
R52 "10kΩ" "RES 0603_1608" 2086.1,1669.62 r90 top
R53 "240Ω" "RES 0603_1608" 2306.1,1839.62 r270 top value="240 Ohms"
R54 "1kΩ" "RES 0603_1608" 2218.54,1669.62 r90 top
R55 "390Ω" "RES 0603_1608" 2306.1,1965.21 r270 top value="390 Ohms"
R56 "10kΩ" "RES 0603_1608" 2086.1,1799.62 r90 top
R57 "2.8kΩ" "RES 0603_1608" 1400,1830 r0 top
R58 "499Ω" "RES 0603_1608" 1266.1,1809.62 r90 top
R59 "5.1kΩ" "RES 0603_1608" 121.61,1165 r0 top value="5.1 Ohms"
R60 "5.1kΩ" "RES 0603_1608" 400,1500 r270 top value="5.1 Ohms"
TP1 "5016" KEYSTONE-5016_V 1780,4690 r0 top
TP2 "5016" KEYSTONE-5016_V 1800,4430 r0 top
TP3 "5016" KEYSTONE-5016_V 2400,4860 r0 top
TP4 "5016" KEYSTONE-5016_V 1550,3740 r0 top
TP5 "5016" KEYSTONE-5016_V 1820,3480 r270 top
TP6 "5016" KEYSTONE-5016_V 2480,3545 r270 top
TP7 "5016" KEYSTONE-5016_V 2880,3540 r270 top
TP8 "5016" KEYSTONE-5016_V 146.1,2850 r0 top
TP9 "5016" KEYSTONE-5016_V 4300,4800 r0 top
TP10 "5016" KEYSTONE-5016_V 900.38,4876.1 r0 top
TP11 "5016" KEYSTONE-5016_V 1200.38,4576.1 r270 top
TP13 "5016" KEYSTONE-5016_V 2590,2490 r90 top
TP14 "5016" KEYSTONE-5016_V 1436.1,2819.62 r180 top
TP15 "5016" KEYSTONE-5016_V 2816.1,1799.62 r0 top
TP16 "5016" KEYSTONE-5016_V 1706.1,1849.62 r0 top
TP17 "5016" KEYSTONE-5016_V 146.1,2150 r0 top
TP18 "5016" KEYSTONE-5016_V 3700,4800 r0 top
U1 "OP07CDR" FP-D0008A-MFG 2170,4500 r270 top
U2 "OP07CDR" FP-D0008A-MFG 1800,3945.55 r270 top
U3 "OP07CDR" FP-D0008A-MFG 2630,4630 r180 top
U4 "OP07CDR" FP-D0008A-MFG 2140,3460 r270 top
U5 "OP07CDR" FP-D0008A-MFG 2280,3965.55 r270 top
U6 "OP07CDR" FP-D0008A-MFG 2700,3960 r270 top
U7 "STM32F103C8T6" STM-LQFP48_L 1710,950 r0 top locked
U8 "OP07CDR" FP-D0008A-MFG 2770,1015 r0 top
U9 "MC33063ADR" D0008A_M 940.38,3596.1 r270 top
U10 "AP2205-W5-7" FP-SOT25-IPC_B 810.38,4566.1 r180 top
U11 "LM337LMX/NOPB" FP-D0008A-MFG 2100.77,2812.14 r180 top
U12 "MC33063ADR" D0008A_M 1616.1,2389.62 r180 top
U13 "LM66100DCKR" SOT65P210X110-6N 1976.1,1639.62 r0 top
U14 "LM317DCYR" "TI SOT-223 DCY" 2521.1,1794.62 r0 top
U15 "TPP361060-T6TR" "3PEAK TSOT23-6-A T6T" 1136.1,1769.62 r180 top
U16 "LM66100DCKR" SOT65P210X110-6N 1976.1,1774.62 r0 top

## Footprints (in the part's own frame and the unit in brackets; to place one, negate y for a bottom-side part, rotate by r counter-clockwise, add the part's x,y. Pads: shape width x height; smd on the part's side, far side on the other; paste and mask are expansions set on the pad)
"3PEAK TSOT23-6-A T6T" [mm] "SOT23-6, 6-Leads, Body 2.93x2.80mm, Pitch 0.95mm"
  rect 1x0.6 smd: 1(-1.35,0.95) 2(-1.35,0) 3(-1.35,-0.95) 4(1.35,-0.95) 5(1.35,0) 6(1.35,0.95)
  silkscreen extent -1.48,-1.55 0.45,1.92, body extent -1.5,-1.53 1.5,1.53, height 0.95
0402 [mm] "SODFL, 2-Leads, Body 0.675x1.075mm, IPC Medium Density"
  rect 0.4x0.7 smd: 1(-0.35,0) 2(0.35,0)
  silkscreen extent -0.8,-0.63 0.92,0.63, body extent -0.51,-0.31 0.5,0.3, height 0.45
"BOURNS SRR6028" [mm] "Precision Wire Wound Inductor, 2-Leads, Body 6.80x6.80mm, IPC Medium Density"
  rect 0.5x7 smd: 1(-3.15,0) 2(3.15,0)
  Top Layer region: 3.6,3.6 1.1,3.6 1.1,2.5 1.4,2.4 1.7,2.1 1.9,2 2.1,1.7 2.3,1.4 2.5,1 2.6,0.7 2.7,0.3 2.7,0 3.6,0
  Top Layer region: 3.6,-3.6 1.1,-3.6 1.1,-2.5 1.4,-2.4 1.7,-2.1 1.9,-2 2.1,-1.7 2.3,-1.4 2.5,-1 2.6,-0.7 2.7,-0.3 2.7,0 3.6,0
  Top Layer region: -3.6,-3.6 -1.1,-3.6 -1.1,-2.5 -1.4,-2.4 -1.7,-2.1 -1.9,-2 -2.1,-1.7 -2.3,-1.4 -2.5,-1 -2.6,-0.7 -2.7,-0.3 -2.7,0 -3.6,0
  Top Layer region: -3.6,3.6 -1.1,3.6 -1.1,2.5 -1.4,2.4 -1.7,2.1 -1.9,2 -2.1,1.7 -2.3,1.4 -2.5,1 -2.6,0.7 -2.7,0.3 -2.7,0 -3.6,0
  Top Layer lines w0.1: -1.1,-3.55 -1.1,-2.5 cw(c0,0) -2.731,0 cw(c0,0) -1.1,2.5 -1.1,3.55 ; 1.1,-3.55 1.1,-2.5 ccw(c0,0) 2.731,0 ccw(c0,0) 1.1,2.5 1.1,3.55
  silkscreen extent -0.4,-3.5 0.4,3.5, body extent -3.4,-3.4 3.4,3.4, height 2.8
"CAP 0603_1608" [mm] "Chip Capacitor, 2-Leads, Body 1.60x0.80mm, IPC Medium Density"
  rect 0.9x1 smd: 1(-0.675,0) 2(0.675,0)
  silkscreen extent -1.4,-0.7 1.4,0.7, body extent -0.8,-0.41 0.8,0.41, height 0.82
"CAP 0805_2012" [mm] "Chip Capacitor, 2-Leads, Body 2.00x1.20mm, IPC Medium Density"
  rect 1.3x1.4 smd: 1(-0.8,0) 2(0.8,0)
  silkscreen extent -1.7,-0.9 1.7,0.9, body extent -1,-0.64 1,0.64, height 1.26
"CAP 1206_3216 - 0.8MM" [mm] "Chip Capacitor, 2-Leads, Body 3.25x1.60mm, IPC Medium Density"
  rect 1.3x1.8 smd: 1(-1.45,0) 2(1.45,0)
  silkscreen extent -2.37,-1.12 2.37,1.12, body extent -1.6,-0.8 1.6,0.8, height 0.8
"CAP ALSMD 4.3MM H5.4MM" [mm] "Aluminum Electrolytic Capacitor, Body 4.30x4.30x5.40mm, IPC Low Density"
  rect 2.5x1.6 smd: 1(-1.75,0) 2(1.75,0)
  silkscreen extent -2.17,-2.21 2.3,2.2, body extent -2.3,-2.2 2.3,2.2, height 5.4
"CAP ALSMD 8.3MM H10.5MM" [mm] "Aluminum Electrolytic Capacitor, Body 8.30x8.30x10.50mm, IPC Low Density"
  rect 4.55x2.3 smd: 1(-3.8,0) 2(3.8,0)
  silkscreen extent -4.15,-4.15 4.15,4.15, body extent -4.95,-4.15 4.95,4.15, height 10.5
D0008A_M [mm] "SOIC, 8-Leads, Body 5x4mm, Pitch 1.27mm, IPC Low Density"
  rrect15% 1.65x0.65 smd: 1(-2.825,1.905) 2(-2.825,0.635) 3(-2.825,-0.635) 4(-2.825,-1.905) 5(2.825,-1.905) 6(2.825,-0.635) 7(2.825,0.635) 8(2.825,1.905)
  silkscreen extent -2.95,-2.5 1.6,2.9, body extent -3,-2.45 3,2.45, height 1.63
"DO214AC SMA" [mm] "Molded Diode, 2-Leads, Body 4.30x2.60mm, IPC Medium Density"
  rect 2.5x1.7 smd: 1(-2,0) 2(2,0)
  silkscreen extent -3.68,-1.65 3.75,1.65, body extent -2.6,-1.37 2.6,1.37, height 2.4
"FER 0603_1608" [mm] "Chip Ferrite, 2-Leads, Body 1.60x0.80mm, IPC Medium Density"
  rect 0.9x1 smd: 1(-0.675,0) 2(0.675,0)
  silkscreen extent -1.4,-0.7 1.4,0.7, body extent -0.8,-0.41 0.8,0.41, height 0.82
FP-D0008A-MFG [mm]
  rrect17% 1.55x0.6 smd paste+0 mask+0: 1(-2.7,1.905) 2(-2.7,0.635) 3(-2.7,-0.635) 4(-2.7,-1.905) 5(2.7,-1.905) 6(2.7,-0.635) 7(2.7,0.635) 8(2.7,1.905)
  silkscreen extent -4.17,-2.5 1.5,2.5, body extent -3.57,-2.75 3.57,2.75, height 0.25
FP-SOD123-IPC_A [mil]
  rect 61.32x29.23 smd paste+0 mask+0: 1(-66.94,0)
  rrect100% 61.32x29.23 smd paste+0 mask+0: 2(66.94,0)
  silkscreen extent -134,-31 52,31, body extent -117,-50 117,50, height 10
FP-SOT25-IPC_B [mm]
  rect 1.407x0.576 smd paste+0 mask+0: 1(-1.151,0.95)
  rrect100% 1.407x0.576 smd paste+0 mask+0: 2(-1.151,0) 3(-1.151,-0.95) 4(1.151,-0.95) 5(1.151,0.95)
  silkscreen extent -2.6,-1.5 0.05,1.5, body extent -2.1,-1.75 2.1,1.75, height 0.25
KEYSTONE-5016_V [mm] "Testpoint, Body 3.81x2.04 mm"
  rect 4.7x3.43 smd: 1(0,0)
  silkscreen extent -2.75,-2.12 2.75,2.11, body extent -1.9,-1.02 1.9,1.02, height 2.29
"LED 0603_1608" [mm] "Chip Diode, 2-Leads, Body 1.60x0.80mm, IPC Medium Density"
  rect 0.8x0.8 smd: 1(-0.75,0) 2(0.75,0)
  silkscreen extent -1.52,-0.7 1.52,0.7, body extent -0.8,-0.4 0.8,0.4, height 0.53
"LED 0603_1608 BLUE" [mm] "Chip Diode, 2-Leads, Body 1.60x0.80mm, IPC Medium Density"
  rect 0.8x0.8 smd: 1(-0.75,0) 2(0.75,0)
  silkscreen extent -1.52,-0.7 1.52,0.7, body extent -0.8,-0.4 0.8,0.4, height 0.53
"LED 0603_1608 GREEN" [mm] "Chip Diode, 2-Leads, Body 1.60x0.80mm, IPC Medium Density"
  rect 0.8x0.8 smd: 1(-0.75,0) 2(0.75,0)
  silkscreen extent -1.52,-0.7 1.52,0.7, body extent -0.8,-0.4 0.8,0.4, height 0.53
"LED 0603_1608 RED" [mm] "Chip Diode, 2-Leads, Body 1.60x0.80mm, IPC Medium Density"
  rect 0.8x0.8 smd: 1(-0.75,0) 2(0.75,0)
  silkscreen extent -1.52,-0.7 1.52,0.7, body extent -0.8,-0.4 0.8,0.4, height 0.53
"Molex 1054500101" [mm] "USB-C Receptacle Connector 24 Position Surface Mount, 24 Position, Body 8.94x7.90mm"
  rect 0.3x0.7 smd: A1(-3,0.655) A2(-2.5,0.655) A3(-2,0.655) A4(-1.5,0.655) A5(-1,0.655) A6(-0.5,0.655) A7(0.5,0.655) A8(1,0.655) A9(1.5,0.655) A10(2,0.655) A11(2.5,0.655) A12(3,0.655) B2(2.25,-0.645) B3(1.75,-0.645) B4(1.25,-0.645) B5(0.75,-0.645) B6(0.25,-0.645) B7(-0.25,-0.645) B8(-0.75,-0.645) B9(-1.25,-0.645) B10(-1.75,-0.645) B11(-2.25,-0.645)
  rect 1x0.7 smd: B1(3.1,-0.655) B12(-3.1,-0.645)
  oval 1.1x2.6 hole 2.1 slot 0.6 at 0 deg: S(-4.34,-5.105) S(4.3,-5.105)
  oval 1.1x2.1 hole 1.6 slot 0.6 at 0 deg: S(-4.32,0.245) S(4.32,0.245)
  silkscreen extent -4.47,-7.07 4.47,0.83, body extent -4.47,-7.06 4.47,0.84, height 3.21
"MOLEX KK 0022272021" [mm]
  oval 2x3 hole 1.2: 1(-1.27,0) 2(1.27,0)
  silkscreen extent -2.54,-2.79 2.54,2.79, body extent -2.54,-2.9 2.54,2.9, height 11.7
"RES 0603_1608" [mm] "Chip Resistor, 2-Leads, Body 1.60x0.80mm, IPC Medium Density"
  rect 0.85x0.95 smd: 1(-0.65,0) 2(0.65,0)
  silkscreen extent -1.27,-0.7 1.27,0.7, body extent -0.8,-0.4 0.8,0.4, height 0.45
"RES 0805_2012" [mm] "Chip Resistor, 2-Leads, Body 2.00x1.25mm, IPC Medium Density"
  rect 1.15x1.35 smd: 1(-0.875,0) 2(0.875,0)
  silkscreen extent -1.7,-0.9 1.7,0.9, body extent -1,-0.62 1,0.63, height 0.6
"RES 2512_6432" [mm] "Chip Resistor, 2-Leads, Body 6.30x3.15mm, IPC Medium Density"
  rect 1.6x3.65 smd: 1(-3.175,0) 2(3.175,0)
  silkscreen extent -4.3,-2.05 4.3,2.05, body extent -3.15,-1.57 3.15,1.57, height 0.7
SOD123F [mm] "SODFL, 2-Leads, Body 1.60x3.50mm, IPC Medium Density"
  rect 1.2x1.2 smd: 1(-1.43,0) 2(1.43,0)
  silkscreen extent -2.41,-1.02 2.41,1.02, body extent -1.75,-0.8 1.75,0.8, height 1.1
SOT65P210X110-6N [mm]
  rrect25% 1.19x0.4 smd: 1(-0.96,0.65) 2(-0.96,0) 3(-0.96,-0.65) 4(0.96,-0.65) 5(0.96,0) 6(0.96,0.65)
  silkscreen extent -2.2,-1.17 0.63,1.17, body extent -1.05,-1 1.05,1, height 1.1
STM-LQFP48_L [mm] "QFP, 48-Leads, Body 7x7mm, Pitch 0.5mm, IPC High Density"
  oval 1.55x0.25 smd: 1(-4.025,2.75) 2(-4.025,2.25) 3(-4.025,1.75) 4(-4.025,1.25) 5(-4.025,0.75) 6(-4.025,0.25) 7(-4.025,-0.25) 8(-4.025,-0.75) 9(-4.025,-1.25) 10(-4.025,-1.75) 11(-4.025,-2.25) 12(-4.025,-2.75) 25(4.025,-2.75) 26(4.025,-2.25) 27(4.025,-1.75) 28(4.025,-1.25) 29(4.025,-0.75) 30(4.025,-0.25) 31(4.025,0.25) 32(4.025,0.75) 33(4.025,1.25) 34(4.025,1.75) 35(4.025,2.25) 36(4.025,2.75)
  oval 0.25x1.55 smd: 13(-2.75,-4.025) 14(-2.25,-4.025) 15(-1.75,-4.025) 16(-1.25,-4.025) 17(-0.75,-4.025) 18(-0.25,-4.025) 19(0.25,-4.025) 20(0.75,-4.025) 21(1.25,-4.025) 22(1.75,-4.025) 23(2.25,-4.025) 24(2.75,-4.025) 37(2.75,4.025) 38(2.25,4.025) 39(1.75,4.025) 40(1.25,4.025) 41(0.75,4.025) 42(0.25,4.025) 43(-0.25,4.025) 44(-0.75,4.025) 45(-1.25,4.025) 46(-1.75,4.025) 47(-2.25,4.025) 48(-2.75,4.025)
  silkscreen extent -4.15,-2.85 2.85,3.55, body extent -3.5,-3.5 3.5,3.5, height 1.6
"TE 282834-4" [mm]
  oval 1.75x2.5 hole 1.1: 1(-3.81,0) 2(-1.27,0) 3(1.27,0) 4(3.81,0)
  silkscreen extent -5.24,-3.2 5.24,3.2
"TE 282834-5" [mm]
  oval 1.75x2.5 hole 1.1: 1(-5.08,0) 2(-2.54,0) 3(0,0) 4(2.54,0) 5(5.08,0)
  silkscreen extent -6.51,-3.2 6.51,3.2
TENSILITY_54-00166 [mm]
  oval 3.6x1.4 hole 0.8 square: A(0,6.25) B(0,0)
  oval 1.4x3.6 hole 0.8 square: C(4.8,3.25)
  silkscreen extent -4.5,-7.5 4.5,7.55, body extent -4.5,-7.5 5,6.8, height 11
"TI SOT-223 DCY" [mm] "SOT223, 4-Leads, Body 6.50x7.00mm (avg), Pitch 2.30mm, IPC Medium Density"
  rect 2x1.5 smd: 1(-3.15,2.3) 2(-3.15,0) 3(-3.15,-2.3)
  rect 2x3.8 smd: 4(3.15,0)
  silkscreen extent -3.27,-3.35 1.85,3.72, body extent -3.52,-3.25 3.5,3.25, height 1.8
TRANS_RD3H045S_ROM [mil]
  rect 35x142 smd paste+0 mask+0: 1(-90.55,-215) 3(90.55,-215)
  rect 209x237 smd paste+0 mask+0: 2(0,63.5)
  silkscreen extent -135,-127 135,127, body extent -130,-272 130,161, height 91
WE-PD_1260P [mm] "SMT Shielded Power Inductor, 2-leads, body 12x12mm"
  rect 5.4x2.9 smd: 1(0,4.95) 2(0,-4.95)
  Top Layer keep-out region: -6,6 -2.9,6 -2.9,3.3 2.9,3.3 2.9,6 6,6 6,-6 2.9,-6 2.9,-3.3 -2.9,-3.3 -2.9,-6 -6,-6
  silkscreen extent -6.25,-6.25 6.25,7.02, body extent -5.99,-6.01 6.01,6.14, height 5.75

## Part data
C1 C2: library part 0805X105K500CT, "CAP CER 1UF 50V X5R 0805", Device Package="0805 (2012 Metric)", Manufacturer="Walsin Technology Corporation", Operating Temperature="-55°C ~ 85°C", Supplier Part Number 1=1292-0805X105K500CT-ND, Temperature Coefficient=X5R, Tolerance=±10%, Voltage - Rated=50V, Applications="General Purpose", Capacitance="1 µF", ComponentLink1Description=Datasheet, ComponentLink1URL=https://www.passivecomponent.com/wp-content/uploads/datasheet/WTC_MLCC_General_Purpose.pdf, ComponentLink2Description="DigiKey Link", ComponentLink2URL=https://www.digikey.com/en/products/detail/walsin-technology-corporation/0805X105K500CT/15978747, LastUpdated="2026-04-06 7:30:03 PM", Lifecycle Status=Active, Minimum Order=1, Mounting Type="Surface Mount, MLCC", Package / Case="0805 (2012 Metric)", Packaging=TapeAndReel, Part Number=0805X105K500CT, PartId=55928, Price=0.01, Series=-, Size / Dimension="0.079\" L x 0.049\" W (2.00mm x 1.25mm)", Supplier 1=DigiKey, Thickness (Max)="0.057\" (1.45mm)"
C3 C4 C5 C6 C7 C8 C24 C26 C32 C33 C34 C35: library part C0603C104K5RAC7411, "CAP CER 0.1UF 50V X7R 0603", Device Package="0603 (1608 Metric)", Manufacturer=KEMET, Operating Temperature="-55°C ~ 125°C", Supplier Part Number 1=399-C0603C104K5RAC7411CT-ND, Temperature Coefficient=X7R, Tolerance=±10%, Voltage - Rated=50V, Applications="Bypass, Decoupling", Capacitance="0.1 µF", ComponentLink1Description=Datasheet, ComponentLink1URL=https://api.kemet.com/component-edge/download/datasheet/C0603C104K5RAC7411.pdf, ComponentLink2Description="DigiKey Link", ComponentLink2URL=https://www.digikey.com/en/products/detail/kemet/C0603C104K5RAC7411/3317013, LastUpdated="2026-04-06 7:23:52 PM", Lifecycle Status=Active, Minimum Order=1, Mounting Type="Surface Mount, MLCC", Package / Case="0603 (1608 Metric)", Packaging=TapeAndReel, Part Number=C0603C104K5RAC7411, Part Status=Active, PartId=2233, Price=0.01, Series="SMD Comm X7R", Size / Dimension="0.063\" L x 0.031\" W (1.60mm x 0.80mm)", Supplier 1=DigiKey, Thickness (Max)="0.035\" (0.90mm)"
C9: library part 08053D105KAT2A, "CAP CER 1UF 25V X5R 0805", Device Package="0805 (2012 Metric)", Manufacturer="AVX Corporation", Operating Temperature="-55°C ~ 85°C", Supplier Part Number 1=478-1409-1-ND, Temperature Coefficient=X5R, Tolerance=±10%, Voltage - Rated=25V, Applications="General Purpose", Capacitance=1µF, ComponentLink1Description=Datasheet, ComponentLink1URL=http://datasheets.avx.com/cx5r.pdf, ComponentLink2Description="DigiKey Link", ComponentLink2URL=http://digikey.com/product-detail/en/avx-corporation/08053D105KAT2A/478-1409-1-ND/564441, LastUpdated="2020-09-02 1:04:40 AM", Lifecycle Status=Active, Minimum Order=1, Mounting Type="Surface Mount, MLCC", Package / Case="0805 (2012 Metric)", Packaging=TapeAndReel, Part Number=08053D105KAT2A, Part Status=Active, PartId=3127, Price=0.12, Series=-, Size / Dimension="0.079\" L x 0.049\" W (2.01mm x 1.25mm)", Supplier 1=DigiKey, Thickness (Max)="0.055\" (1.40mm)"
C10 C11: library part C0603C105K4RACAUTO, "CAP CER 1UF 16V X7R 0603", Device Package="0603 (1608 Metric)", Manufacturer=KEMET, Operating Temperature="-55°C ~ 125°C", Ratings=AEC-Q200, Supplier Part Number 1=399-17704-1-ND, Temperature Coefficient=X7R, Tolerance=±10%, Voltage - Rated=16V, Applications="Automotive, Bypass, Decoupling", Capacitance="1 µF", ComponentLink1Description=Datasheet, ComponentLink1URL=https://api.kemet.com/component-edge/download/datasheet/C0603C105K4RACAUTO.pdf, ComponentLink2Description="DigiKey Link", ComponentLink2URL=https://www.digikey.com/en/products/detail/kemet/C0603C105K4RACAUTO/8635831, LastUpdated="2026-04-06 7:23:53 PM", Lifecycle Status=Active, Minimum Order=1, Mounting Type="Surface Mount, MLCC", Package / Case="0603 (1608 Metric)", Packaging=TapeAndReel, Part Number=C0603C105K4RACAUTO, Part Status=Active, PartId=2179, Price=0.02, Series="SMD Auto X7R", Size / Dimension="0.063\" L x 0.031\" W (1.60mm x 0.80mm)", Supplier 1=DigiKey, Thickness (Max)="0.037\" (0.95mm)"
C12 C13: library part 0805X475K250CT, "CAP CER 4.7UF 25V X5R 0805", Device Package="0805 (2012 Metric)", Manufacturer="Walsin Technology Corporation", Operating Temperature="-55°C ~ 85°C", Supplier Part Number 1=1292-0805X475K250CT-ND, Temperature Coefficient=X5R, Tolerance=±10%, Voltage - Rated=25V, Applications="General Purpose", Capacitance="4.7 µF", ComponentLink1Description=Datasheet, ComponentLink1URL=https://www.passivecomponent.com/wp-content/uploads/datasheet/WTC_MLCC_General_Purpose.pdf, ComponentLink2Description="DigiKey Link", ComponentLink2URL=https://www.digikey.com/en/products/detail/walsin-technology-corporation/0805X475K250CT/14836837, LastUpdated="2026-04-06 7:32:06 PM", Lifecycle Status=Active, Minimum Order=1, Mounting Type="Surface Mount, MLCC", Package / Case="0805 (2012 Metric)", Packaging=TapeAndReel, Part Number=0805X475K250CT, Part Status=Active, PartId=33404, Price=0.03, Series=-, Size / Dimension="0.079\" L x 0.049\" W (2.00mm x 1.25mm)", Supplier 1=DigiKey, Thickness (Max)="0.057\" (1.45mm)"
C14: library part AC0603JRNPO9BN331, "CAP CER 330PF 50V C0G/NPO 0603", Device Package="0603 (1608 Metric)", Manufacturer=Yageo, Operating Temperature="-55°C ~ 125°C", Ratings=AEC-Q200, Supplier Part Number 1=311-3280-1-ND, Temperature Coefficient="C0G, NP0", Tolerance=±5%, Voltage - Rated=50V, Applications=Automotive, Capacitance="330 pF", ComponentLink1Description=Datasheet, ComponentLink1URL=http://www.yageo.com/NewPortal/_en/search/productDocs.jsp?YageoPartNumber=AC0603JRNPO9BN331, ComponentLink2Description="DigiKey Link", ComponentLink2URL=https://www.digikey.com/en/products/detail/yageo/AC0603JRNPO9BN331/6643266, LastUpdated="2026-04-06 7:23:52 PM", Lifecycle Status=Active, Minimum Order=1, Mounting Type="Surface Mount, MLCC", Package / Case="0603 (1608 Metric)", Packaging=TapeAndReel, Part Number=AC0603JRNPO9BN331, Part Status=Active, PartId=2321, Price=0.01, Series=AC, Size / Dimension="0.063\" L x 0.031\" W (1.60mm x 0.80mm)", Supplier 1=DigiKey, Thickness (Max)="0.035\" (0.90mm)"
C15 C16: library part 0805B105K500CT, "CAP CER 1UF 50V X7R 0805", Device Package="0805 (2012 Metric)", Manufacturer="Walsin Technology Corporation", Operating Temperature="-55°C ~ 125°C", Supplier Part Number 1=1292-0805B105K500CT-ND, Temperature Coefficient=X7R, Tolerance=±10%, Voltage - Rated=50V, Applications="General Purpose", Capacitance="1 µF", ComponentLink1Description=Datasheet, ComponentLink1URL=https://www.passivecomponent.com/wp-content/uploads/datasheet/WTC_MLCC_General_Purpose.pdf, ComponentLink2Description="DigiKey Link", ComponentLink2URL=https://www.digikey.com/en/products/detail/walsin-technology-corporation/0805B105K500CT/14836864, LastUpdated="2026-04-06 7:31:50 PM", Lifecycle Status=Active, Minimum Order=1, Mounting Type="Surface Mount, MLCC", Package / Case="0805 (2012 Metric)", Packaging=TapeAndReel, Part Number=0805B105K500CT, Part Status=Active, PartId=41252, Price=0.01, Series=-, Size / Dimension="0.079\" L x 0.049\" W (2.00mm x 1.25mm)", Supplier 1=DigiKey, Thickness (Max)="0.057\" (1.45mm)"
C17 C22: library part UCD1V101MNL1GS, "CAP ALUM 100UF 20% 35V SMD", Device Package="Radial, Can - SMD", Lifetime @ Temp.="5000 Hrs @ 105°C", Manufacturer=Nichicon, Operating Temperature="-55°C ~ 105°C", Ratings=AEC-Q200, Ripple Current @ High Frequency="600 mA @ 100 kHz", Ripple Current @ Low Frequency="300 mA @ 120 Hz", Supplier Part Number 1=493-6186-1-ND, Tolerance=±20%, Voltage - Rated="35 V", Applications=Automotive, Capacitance="100 µF", ComponentLink1Description=Datasheet, ComponentLink1URL=http://nichicon-us.com/english/products/pdfs/e-ucd.pdf, ComponentLink2Description="DigiKey Link", ComponentLink2URL=https://www.digikey.com/en/products/detail/nichicon/UCD1V101MNL1GS/3439293, Height - Seated (Max)="0.413\" (10.50mm)", Impedance="160 mOhms", LastUpdated="2026-04-05 8:53:58 PM", Lifecycle Status=Active, Minimum Order=1, Mounting Type="Surface Mount", Package / Case="Radial, Can - SMD", Packaging=TapeAndReel, Part Number=UCD1V101MNL1GS, Part Status=Active, PartId=7455, Polarization=Polar, Price=0.14, Series=UCD, Size / Dimension="0.315\" Dia (8.00mm)", Supplier 1=DigiKey, Surface Mount Land Size="0.327\" L x 0.327\" W (8.30mm x 8.30mm)"
C18 C23: library part UCV1V471MNL1GS, "CAP ALUM 470UF 20% 35V SMD", Device Package="Radial, Can - SMD", Lifetime @ Temp.="2000 Hrs @ 105°C", Manufacturer=Nichicon, Operating Temperature="-55°C ~ 105°C", Ratings=AEC-Q200, Ripple Current @ High Frequency="850 mA @ 100 kHz", Ripple Current @ Low Frequency="425 mA @ 120 Hz", Supplier Part Number 1=493-14356-1-ND, Tolerance=±20%, Voltage - Rated="35 V", Applications="General Purpose", Capacitance="470 µF", ComponentLink1Description=Datasheet, ComponentLink1URL=http://nichicon-us.com/english/products/pdfs/e-ucv.pdf, ComponentLink2Description="DigiKey Link", ComponentLink2URL=https://www.digikey.com/en/products/detail/nichicon/UCV1V471MNL1GS/5724335, Height - Seated (Max)="0.413\" (10.50mm)", Impedance="80 mOhms", LastUpdated="2026-04-05 8:53:55 PM", Lifecycle Status=Active, Minimum Order=1, Mounting Type="Surface Mount", Package / Case="Radial, Can - SMD", Packaging=TapeAndReel, Part Number=UCV1V471MNL1GS, Part Status=Active, PartId=27851, Polarization=Polar, Price=0.38, Series=UCV, Size / Dimension="0.315\" Dia (8.00mm)", Supplier 1=DigiKey, Surface Mount Land Size="0.327\" L x 0.327\" W (8.30mm x 8.30mm)"
C19 C20: library part 865080540004, "CAP ALUM 10UF 20% 35V SMD", Device Package="Radial, Can - SMD", Lifetime @ Temp.="2000 Hrs @ 105°C", Manufacturer="Würth Elektronik", Operating Temperature="-55°C ~ 105°C", Ripple Current @ High Frequency="90 mA @ 100 kHz", Ripple Current @ Low Frequency="53.1 mA @ 120 Hz", Supplier Part Number 1=732-8503-1-ND, Tolerance=±20%, Voltage - Rated="35 V", Applications="General Purpose", Capacitance="10 µF", ComponentLink1Description=Datasheet, ComponentLink1URL=https://katalog.we-online.de/pbs/datasheet/865080540004.pdf, ComponentLink2Description="DigiKey Link", ComponentLink2URL=https://www.digikey.com/en/products/detail/würth-elektronik/865080540004/5728098, Height - Seated (Max)="0.217\" (5.50mm)", Impedance="2 Ohms", LastUpdated="2026-04-05 8:29:50 PM", Lifecycle Status=Active, Minimum Order=1, Mounting Type="Surface Mount", Package / Case="Radial, Can - SMD", Packaging=TapeAndReel, Part Number=865080540004, Part Status=Active, PartId=7376, Polarization=Polar, Price=0.10, Series=WCAP-ASLI, Size / Dimension="0.157\" Dia (4.00mm)", Supplier 1=DigiKey, Surface Mount Land Size="0.169\" L x 0.169\" W (4.30mm x 4.30mm)"
C21: library part 06035A181FAT2A, "CAP CER 180PF 50V C0G/NP0 0603", Device Package="0603 (1608 Metric)", Manufacturer="AVX Corporation", Operating Temperature="-55°C ~ 125°C", Supplier Part Number 1=478-6029-1-ND, Temperature Coefficient="C0G, NP0", Tolerance=±1%, Voltage - Rated=50V, Applications="General Purpose", Capacitance=180pF, ComponentLink1Description=Datasheet, ComponentLink1URL=http://datasheets.avx.com/C0GNP0-Dielectric.pdf, ComponentLink2Description="DigiKey Link", ComponentLink2URL=http://digikey.com/product-detail/en/avx-corporation/06035A181FAT2A/478-6029-1-ND/2208943, LastUpdated="2020-09-02 1:03:35 AM", Lifecycle Status=Active, Minimum Order=1, Mounting Type="Surface Mount, MLCC", Package / Case="0603 (1608 Metric)", Packaging=TapeAndReel, Part Number=06035A181FAT2A, Part Status=Active, PartId=2669, Price=0.11, Series=-, Size / Dimension="0.063\" L x 0.032\" W (1.60mm x 0.81mm)", Supplier 1=DigiKey, Thickness (Max)="0.035\" (0.90mm)"
C25: library part CC0603ZRY5V7BB225, "CAP CER 2.2UF 16V Y5V 0603", Device Package="0603 (1608 Metric)", Manufacturer=Yageo, Operating Temperature="-30°C ~ 85°C", Supplier Part Number 1=311-3416-1-ND, Temperature Coefficient="Y5V (F)", Tolerance="-20%, +80%", Voltage - Rated=16V, Applications="General Purpose", Capacitance="2.2 µF", ComponentLink1Description=Datasheet, ComponentLink1URL=http://www.yageo.com/documents/recent/UPY-GPHC_Y5V_6.3V-to-50V_8.pdf, ComponentLink2Description="DigiKey Link", ComponentLink2URL=https://www.digikey.com/en/products/detail/yageo/CC0603ZRY5V7BB225/5883851, LastUpdated="2026-04-06 7:23:53 PM", Lifecycle Status=Active, Minimum Order=1, Mounting Type="Surface Mount, MLCC", Package / Case="0603 (1608 Metric)", Packaging=TapeAndReel, Part Number=CC0603ZRY5V7BB225, Part Status=Active, PartId=2203, Price=0.01, Series=CC, Size / Dimension="0.063\" L x 0.031\" W (1.60mm x 0.80mm)", Supplier 1=DigiKey, Thickness (Max)="0.035\" (0.90mm)"
C27 C28 C29: library part 0805X106K250CT, "CAP CER 10UF 25V X5R 0805", Device Package="0805 (2012 Metric)", Manufacturer="Walsin Technology Corporation", Operating Temperature="-55°C ~ 85°C", Supplier Part Number 1=1292-0805X106K250CT-ND, Temperature Coefficient=X5R, Tolerance=±10%, Voltage - Rated=25V, Applications="General Purpose", Capacitance="10 µF", ComponentLink1Description=Datasheet, ComponentLink1URL=https://www.passivecomponent.com/wp-content/uploads/datasheet/WTC_MLCC_General_Purpose.pdf, ComponentLink2Description="DigiKey Link", ComponentLink2URL=https://www.digikey.com/en/products/detail/walsin-technology-corporation/0805X106K250CT/14836836, LastUpdated="2026-04-06 7:31:50 PM", Lifecycle Status=Active, Minimum Order=1, Mounting Type="Surface Mount, MLCC", Package / Case="0805 (2012 Metric)", Packaging=TapeAndReel, Part Number=0805X106K250CT, Part Status=Active, PartId=41243, Price=0.01, Series=-, Size / Dimension="0.079\" L x 0.049\" W (2.00mm x 1.25mm)", Supplier 1=DigiKey, Thickness (Max)="0.057\" (1.45mm)"
C30 C31: library part UMK316ABJ475KD-T, "CAP CER 4.7UF 50V X5R 1206", Device Package="1206 (3216 Metric)", Manufacturer="Taiyo Yuden", Operating Temperature="-55°C ~ 85°C", Supplier Part Number 1=587-2988-1-ND, Temperature Coefficient=X5R, Tolerance=±10%, Voltage - Rated=50V, Applications="SMPS Filtering", Capacitance="4.7 µF", ComponentLink1Description=Datasheet, ComponentLink1URL=https://www.yuden.co.jp/productdata/catalog/mlcc01_e.pdf, ComponentLink2Description="DigiKey Link", ComponentLink2URL=https://www.digikey.com/en/products/detail/taiyo-yuden/UMK316ABJ475KD-T/2714166, LastUpdated="2026-04-06 7:38:00 PM", Lifecycle Status=Active, Minimum Order=1, Mounting Type="Surface Mount, MLCC", Package / Case="1206 (3216 Metric)", Packaging=TapeAndReel, Part Number=UMK316ABJ475KD-T, Part Status=Active, PartId=18934, Price=0.08, Series=M, Size / Dimension="0.126\" L x 0.063\" W (3.20mm x 1.60mm)", Supplier 1=DigiKey, Thickness (Max)="0.037\" (0.95mm)"
C36: library part 06033D105MAT2A, "CAP CER 1UF 25V X5R 0603", Device Package="0603 (1608 Metric)", Manufacturer="AVX Corporation", Operating Temperature="-55°C ~ 85°C", Supplier Part Number 1=478-4531-1-ND, Temperature Coefficient=X5R, Tolerance=±20%, Voltage - Rated=25V, Applications="General Purpose", Capacitance=1µF, ComponentLink1Description=Datasheet, ComponentLink1URL=http://datasheets.avx.com/cx5r.pdf, ComponentLink2Description="DigiKey Link", ComponentLink2URL=http://digikey.com/product-detail/en/avx-corporation/06033D105MAT2A/478-4531-1-ND/1645882, LastUpdated="2020-09-02 1:03:35 AM", Lifecycle Status=Active, Minimum Order=1, Mounting Type="Surface Mount, MLCC", Package / Case="0603 (1608 Metric)", Packaging=TapeAndReel, Part Number=06033D105MAT2A, Part Status=Active, PartId=2656, Price=0.11, Series=-, Size / Dimension="0.063\" L x 0.032\" W (1.60mm x 0.81mm)", Supplier 1=DigiKey, Thickness (Max)="0.035\" (0.90mm)"
D1: library part 5973905607F, "LED WHITE 0603 SMD", Current - Test=5mA, Device Package="0603 (1608 Metric)", Lens Color=0.45mm, Manufacturer=Dialight, Supplier Device Package=0603, Supplier Part Number 1=350-4395-1-ND, Voltage - Forward (Vf) (Typ)=2.925V, Color=White, ComponentLink2Description="DigiKey Link", ComponentLink2URL=https://www.digikey.com/en/products/detail/dialight/5973905607F/9385450, Configuration=Standard, Height (Max)=0.45mm, LastUpdated="2026-04-05 8:43:50 PM", Lens Size="1.20mm x 0.80mm", Lens Style="Rectangle with Flat Top", Lifecycle Status=Active, Minimum Order=1, Mounting Type="Surface Mount", Package / Case="0603 (1608 Metric)", Packaging=TapeAndReel, Part Number=5973905607F, Part Status=Active, PartId=883, Price=0.09, Series=597, Size / Dimension="1.60mm L x 0.80mm W", Supplier 1=DigiKey, Viewing Angle=130°
D2: library part VLMB1300-GS08, "LED BLUE 0603 SMD", Current - Test=20mA, Device Package="0603 (1608 Metric)", Lens Color=1.00mm, Manufacturer="Vishay Semiconductor Opto Division", Millicandela Rating=104mcd, Supplier Device Package=0603, Supplier Part Number 1=VLMB1300-GS08CT-ND, Voltage - Forward (Vf) (Typ)=3.3V, Color=Blue, ComponentLink1Description=Datasheet, ComponentLink1URL=http://www.vishay.com/docs/82437/vlmo1300.pdf, ComponentLink2Description="DigiKey Link", ComponentLink2URL=https://www.digikey.com/en/products/detail/vishay-semiconductor-opto-division/VLMB1300-GS08/3025494, Configuration=Standard, Height (Max)=1.00mm, LastUpdated="2026-04-05 8:35:04 PM", Lens Size="1.10mm x 0.80mm", Lens Style="Rectangle with Flat Top", Lifecycle Status=Active, Minimum Order=1, Mounting Type="Surface Mount", Package / Case="0603 (1608 Metric)", Packaging=TapeAndReel, Part Number=VLMB1300-GS08, Part Status=Active, PartId=785, Price=0.06, Series=CHIPLED, Size / Dimension="1.60mm L x 0.80mm W", Supplier 1=DigiKey, Viewing Angle=130°, Wavelength - Dominant=470nm, Wavelength - Peak=468nm
D3: library part SM0603GCL, "LED GREEN CLEAR 0603 SMD", Current - Test=2mA, Device Package="0603 (1608 Metric)", Lens Color=Colorless, Manufacturer="Bivar Inc.", Millicandela Rating=3.6mcd, Supplier Device Package=0603, Supplier Part Number 1=492-2523-1-ND, Voltage - Forward (Vf) (Typ)=1.9V, Color=Green, ComponentLink1Description=Datasheet, ComponentLink1URL=https://www.bivar.com/Files/Datasheets/SM0603GCL.pdf, ComponentLink2Description="DigiKey Link", ComponentLink2URL=https://www.digikey.com/en/products/detail/bivar-inc/SM0603GCL/3095514, Configuration=Standard, Height (Max)=0.60mm, LastUpdated="2026-04-05 8:36:38 PM", Lens Size="1.00mm x 0.80mm", Lens Style="Rectangle with Flat Top", Lens Transparency=Clear, Lifecycle Status=Active, Minimum Order=1, Mounting Type="Surface Mount", Package / Case="0603 (1608 Metric)", Packaging=TapeAndReel, Part Number=SM0603GCL, Part Status=Active, PartId=622, Price=0.19, Series=-, Size / Dimension="1.60mm L x 0.80mm W", Supplier 1=DigiKey, Viewing Angle=130°, Wavelength - Dominant=574nm, Wavelength - Peak=575nm
D4: library part 5973005507F, "LED RED 0603 SMD", Current - Test=20mA, Device Package="0603 (1608 Metric)", Lens Color=0.68mm, Manufacturer=Dialight, Millicandela Rating=90mcd, Supplier Device Package=0603, Supplier Part Number 1=350-4374-1-ND, Voltage - Forward (Vf) (Typ)=2V, Color=Red, ComponentLink1Description=Datasheet, ComponentLink1URL=http://www.dialightsignalsandcomponents.com/Assets/Drawings/2D_Drawings_DrawingDetailedSpec/NewDrawings/18369A.pdf, ComponentLink2Description="DigiKey Link", ComponentLink2URL=https://www.digikey.com/en/products/detail/dialight/5973005507F/9385429, Configuration=Standard, Height (Max)=0.68mm, LastUpdated="2026-04-05 8:38:00 PM", Lens Size="1.20mm x 0.80mm", Lens Style="Rectangle with Flat Top", Lifecycle Status=Active, Minimum Order=1, Mounting Type="Surface Mount", Package / Case="0603 (1608 Metric)", Packaging=TapeAndReel, Part Number=5973005507F, Part Status=Active, PartId=378, Price=0.09, Series=597, Size / Dimension="1.60mm L x 0.80mm W", Supplier 1=DigiKey, Wavelength - Dominant=630nm
D5 D6 D9: library part CMP-0303-00003-3, "DIODE SCHOTTKY 40V 1A SOD123", Average Rectified Current=1A, Capacitance=110pF, Case/Package=SOD-123-2, Forward Voltage=450mV, Max Forward Surge Current (Ifsm)=25A, Max Operating Temperature=125°C, Max Power Dissipation=450mW, Max Repetitive Reverse Voltage (Vrrm)=40V, Min Operating Temperature=-65°C, Package Quantity=3000, Peak Reverse Current=50uA, Contact Plating=Tin, Current Rating=1A, Element Configuration=Single, Forward Current=1A, Height=1.25mm, Lead Free="Lead Free", Length=2.85mm, Max Reverse Voltage (DC)=40V, Number of Pins=2, Output Current=1A, Packaging="Tape and Reel", Peak Non-Repetitive Surge Current=25A, Polarity=Standard, Radiation Hardening=No, REACH SVHC="No SVHC", Termination=SMD/SMT, Voltage Rating (DC)=40V, Weight=0.000353oz, Width=1.7mm
D7: "TVS DIODE 12.8VWM 27.2V DO214AC", Current - Peak Pulse (10/1000µs)="147A (8/20µs)", Manufacturer=STMicroelectronics, Operating Temperature="-40°C ~ 150°C (TJ)", Package / Case="DO-214AC, SMA", Power - Peak Pulse=600W, Power Line Protection=No, Supplier Device Package="DO-214AC (SMA)", Supplier Part Number 1=497-11825-1-ND, Voltage - Breakdown (Min)=14.3V, Voltage - Clamping (Max) @ Ipp=27.2V, Voltage - Reverse Standoff (Typ)=12.8V, Applications=Automotive, ComponentLink1Description=Datasheet, ComponentLink1URL=http://www.st.com/content/ccc/resource/technical/document/datasheet/93/f7/c5/38/17/3c/42/37/CD00283518.pdf/files/CD00283518.pdf/_jcr_content/translations/en.CD00283518.pdf, ComponentLink2Description="DigiKey Link", ComponentLink2URL=https://www.digikey.com/en/products/detail/stmicroelectronics/SMA6T15AY/2756484, LastUpdated="2026-04-05 8:34:14 PM", Lifecycle Status=Active, Minimum Order=1, Mounting Type="Surface Mount", Packaging=TapeAndReel, Part Number=SMA6T15AY, Part Status=Active, PartId=5556, Price=0.24, Series="SMA6TY, TRANSIL™", Supplier 1=DigiKey, Type=Zener, Unidirectional Channels=1
D8: "TVS DIODE 5.5VWM 14VC 2X1SON", Current - Peak Pulse (10/1000µs)="2.5A (8/20µs)", Device Package="0402 (1005 Metric)", Manufacturer="Texas Instruments", Operating Temperature="-40°C ~ 125°C (TA)", Power - Peak Pulse=40W, Power Line Protection=Yes, Supplier Device Package="2-X1SON (1x.60)", Supplier Part Number 1=296-39342-1-ND, Voltage - Breakdown (Min)=6.5V, Voltage - Clamping (Max) @ Ipp=14V, Voltage - Reverse Standoff (Typ)="5.5V (Max)", Applications=HDMI, ComponentLink1Description=Datasheet, ComponentLink1URL=http://www.ti.com/general/docs/suppproductinfo.tsp?distId=10&gotoUrl=http%3A%2F%2Fwww.ti.com%2Flit%2Fgpn%2Ftpd1e05u06, ComponentLink2Description="DigiKey Link", ComponentLink2URL=https://www.digikey.com/en/products/detail/texas-instruments/TPD1E05U06DPYT/3902056, LastUpdated="2026-04-05 9:01:42 PM", Lifecycle Status=Active, Minimum Order=1, Mounting Type="Surface Mount", Package / Case="0402 (1005 Metric)", Packaging=TapeAndReel, Part Number=TPD1E05U06DPYT, Part Status=Active, PartId=10366, Price=0.32, Series=-, Supplier 1=DigiKey, Type=Zener, Unidirectional Channels=1
D10: "SCHOTTKY 20V SOD-123FL", Capacitance @ Vr, F="110pF @ 4V, 1MHz", Current - Average Rectified (Io)=1A, Current - Reverse Leakage @ Vr="100 µA @ 20 V", Manufacturer="SMC Diode Solutions", Operating Temperature - Junction="-55°C ~ 150°C", Package / Case=SOD-123F, Supplier Device Package=SOD-123FL, Supplier Part Number 1=1655-1925-1-ND, Voltage - DC Reverse (Vr) (Max)="20 V", Voltage - Forward (Vf) (Max) @ If="500 mV @ 1 A", ComponentLink1Description=Datasheet, ComponentLink1URL=http://www.smc-diodes.com/propdf/DSS12U%20THRU%20DSS125U%20N1873%20REV.A.pdf, ComponentLink2Description="DigiKey Link", ComponentLink2URL=https://www.digikey.com/en/products/detail/smc-diode-solutions/DSS12UTR/8341857, Diode Type=Schottky, LastUpdated="2026-04-05 8:31:53 PM", Lifecycle Status=Active, Minimum Order=1, Mounting Type="Surface Mount", Packaging=TapeAndReel, Part Number=DSS12UTR, Part Status=Active, PartId=2514, Price=0.03, Series=-, Speed="Fast Recovery =< 500ns, > 200mA (Io)", Supplier 1=DigiKey
FB1: library part BLM18BD121BH1D, "FERRITE BEAD 120 OHM 0603 1LN", Current Rating (Max)=300mA, DC Resistance (DCR) (Max)=400mOhm, Device Package="0603 (1608 Metric)", Manufacturer="Murata Electronics", Operating Temperature="-55°C ~ 150°C", Ratings=AEC-Q200, Supplier Part Number 1=490-14041-1-ND, ComponentLink1Description=Datasheet, ComponentLink1URL=https://www.murata.com/en-us/products/productdata/8798137286686/QNFA9129.pdf, ComponentLink2Description="DigiKey Link", ComponentLink2URL=https://www.digikey.com/en/products/detail/murata-electronics/BLM18BD121BH1D/6156012, Filter Type="Power Line", Height (Max)="0.037\" (0.95mm)", Impedance @ Frequency="120 Ohms @ 100 MHz", LastUpdated="2026-04-05 8:28:12 PM", Lifecycle Status=Active, Minimum Order=1, Mounting Type="Surface Mount", Number of Lines=1, Package / Case="0603 (1608 Metric)", Packaging=TapeAndReel, Part Number=BLM18BD121BH1D, Part Status=Active, PartId=562, Price=0.03, Series="EMIFIL®, BLM18", Size / Dimension="0.063\" L x 0.031\" W (1.60mm x 0.80mm)", Supplier 1=DigiKey
J1 J3 J4 J6 J8 J9: "TERM BLK 5P SIDE ENT 2.54MM PCB", Color=Green, Current=10A, Manufacturer="TE Connectivity AMP Connectors", Supplier Part Number 1=A98336-ND, Voltage=150V, ComponentLink1Description=Datasheet, ComponentLink1URL=https://www.te.com/commerce/DocumentDelivery/DDEController?Action=srchrtrv&DocNm=282834&DocType=Customer+Drawing&DocLang=English, ComponentLink2Description="DigiKey Link", ComponentLink2URL=http://digikey.com/product-detail/en/te-connectivity-amp-connectors/282834-5/A98336-ND/1153266, LastUpdated="2020-01-15 4:16:19 AM", Lifecycle Status=Active, Mating Orientation="Horizontal with Board", Minimum Order=1, Mounting Type="Through Hole", Number of Levels=1, Packaging=Bulk, Part Number=282834-5, Part Status=Active, Pitch="0.100\" (2.54mm)", Positions Per Level=5, Price=2.99, Series=Buchanan, Supplier 1=DigiKey, Wire Gauge="16-30 AWG", Wire Termination="Screw - Rising Cage Clamp"
J2: "TERM BLK 4P SIDE ENT 2.54MM PCB", Color=Green, Current=10A, Manufacturer="TE Connectivity AMP Connectors", Supplier Part Number 1=A98335-ND, Voltage=150V, ComponentLink1Description=Datasheet, ComponentLink1URL=https://www.te.com/commerce/DocumentDelivery/DDEController?Action=srchrtrv&DocNm=282834&DocType=Customer+Drawing&DocLang=English, ComponentLink2Description="DigiKey Link", ComponentLink2URL=http://digikey.com/product-detail/en/te-connectivity-amp-connectors/282834-4/A98335-ND/1153265, LastUpdated="2020-01-15 4:16:05 AM", Lifecycle Status=Active, Mating Orientation="Horizontal with Board", Minimum Order=1, Mounting Type="Through Hole", Number of Levels=1, Packaging=Bulk, Part Number=282834-4, Part Status=Active, Pitch="0.100\" (2.54mm)", Positions Per Level=4, Price=2.68, Series=Buchanan, Supplier 1=DigiKey, Wire Gauge="16-30 AWG", Wire Termination="Screw - Rising Cage Clamp"